# Altium PCB ARGUS.PcbDoc (part 1 of 4)
Units mm, origin at the board's own origin, x right, y up, seen from the top; angles counter-clockwise.
Board outline 134 x 81 mm, 6 copper layers (L1 [SIG], L2 [GND], L3 [PWR], L4 [SIG], L5 [GND], L6 [SIG]), stack 1.538 mm thick; 452 components, 305 nets, 1467 pads, 826 vias.
Unrouted connection lines stored in the file: 646.
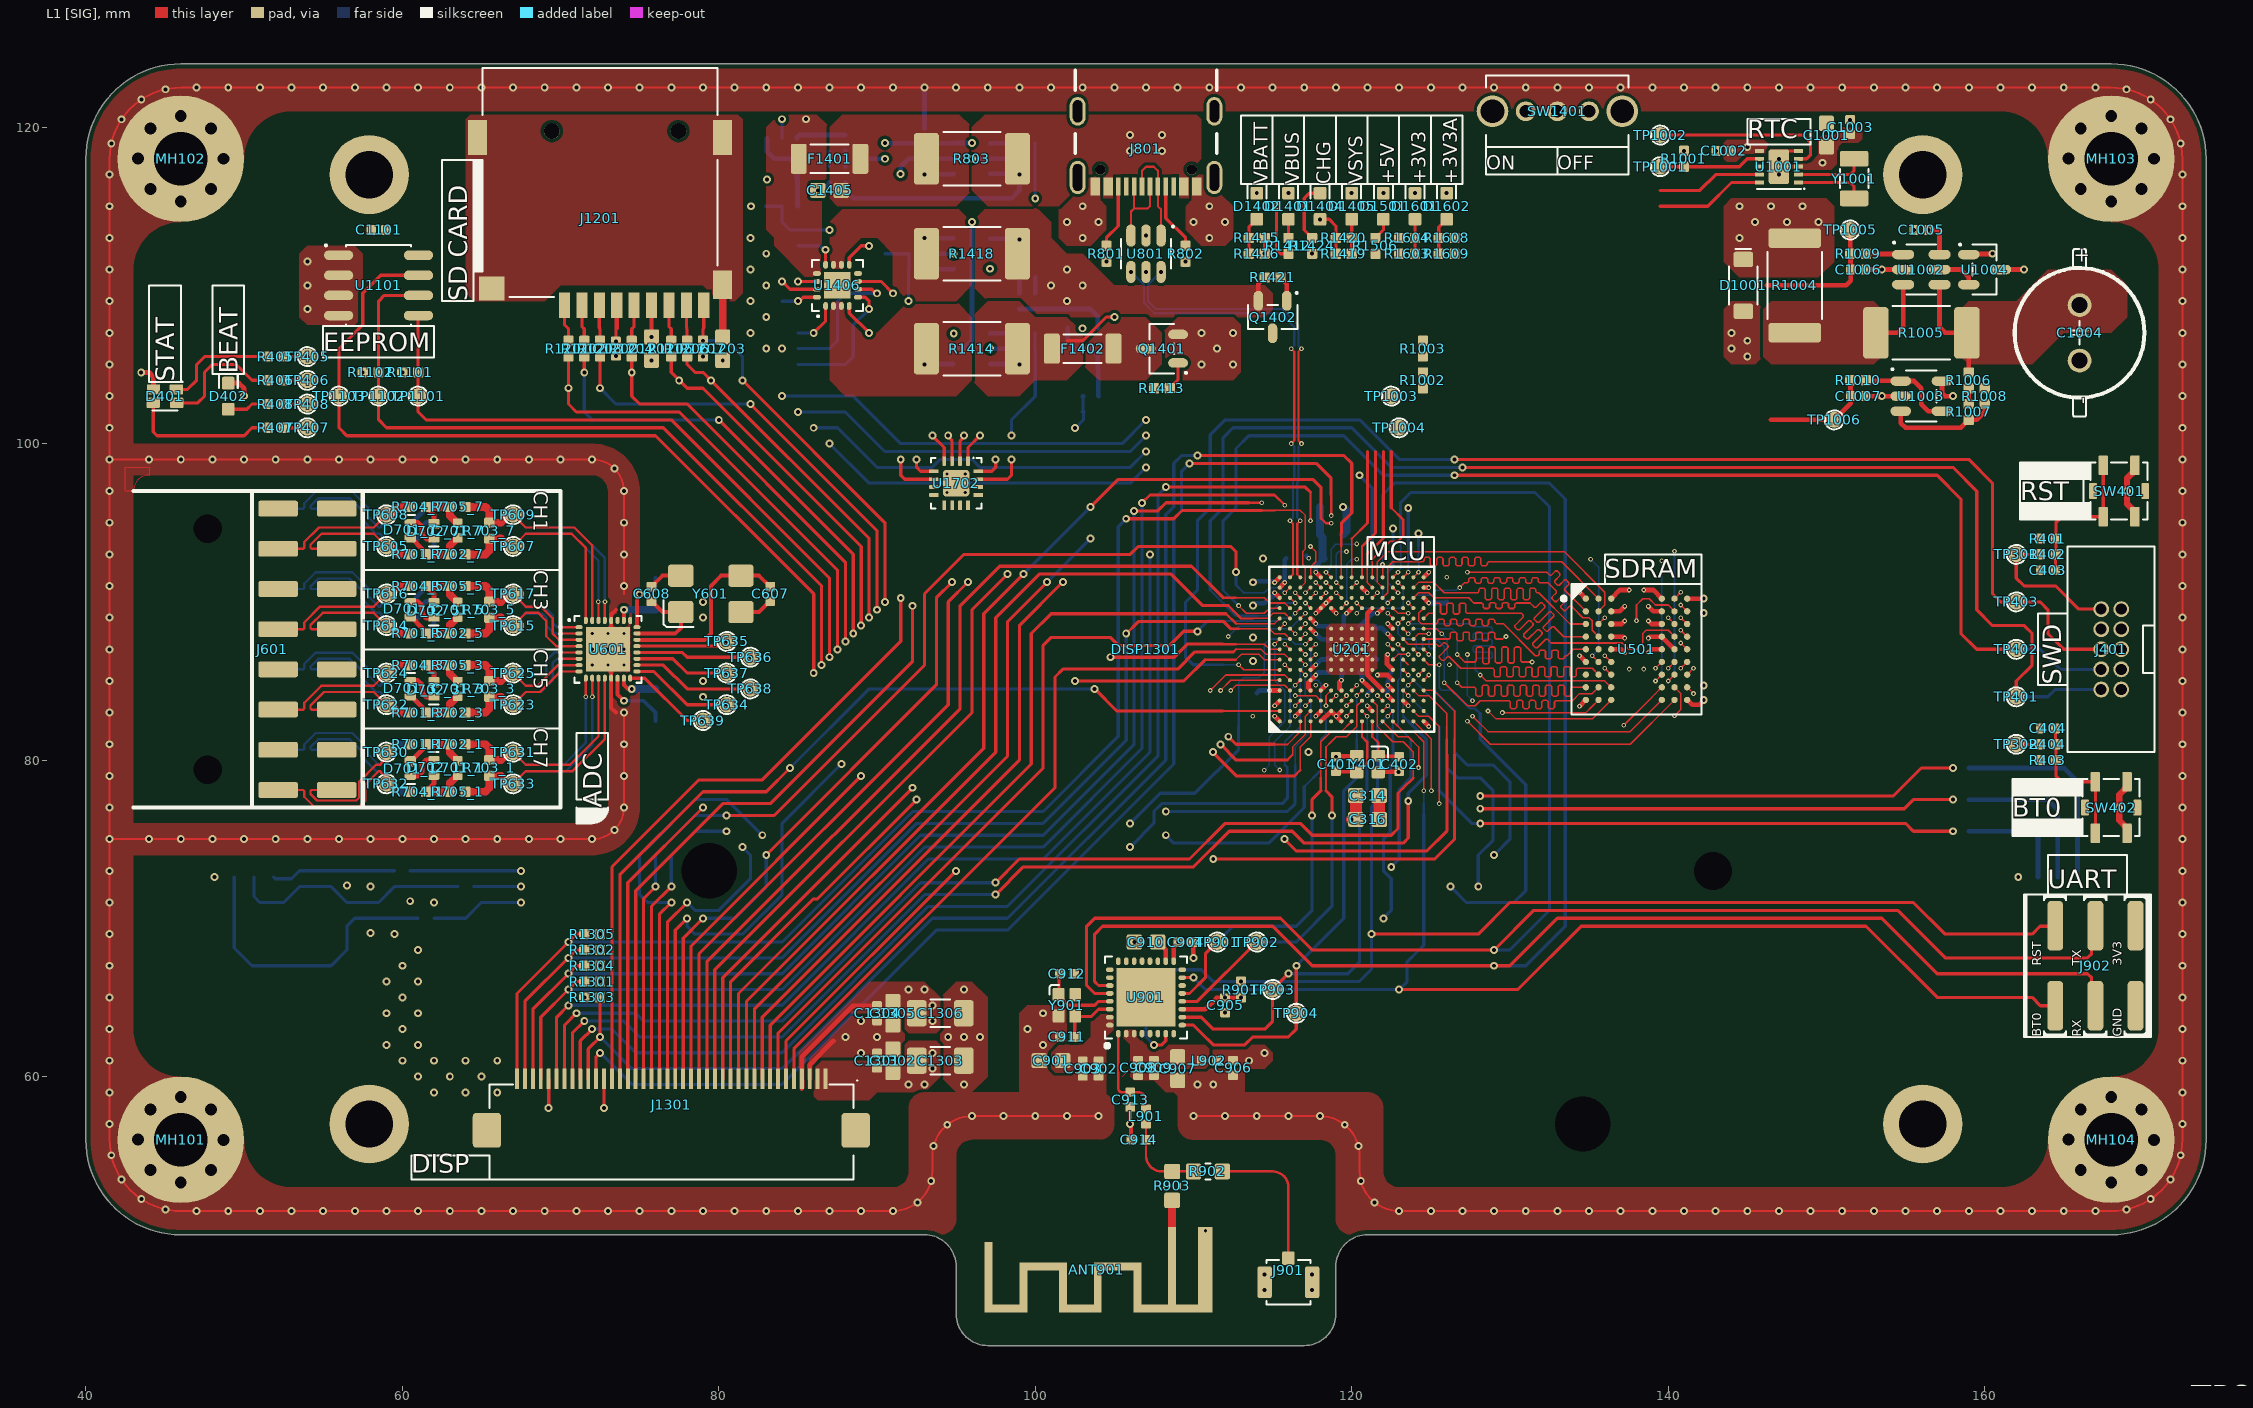
[diagram p0: L1 [SIG] view]
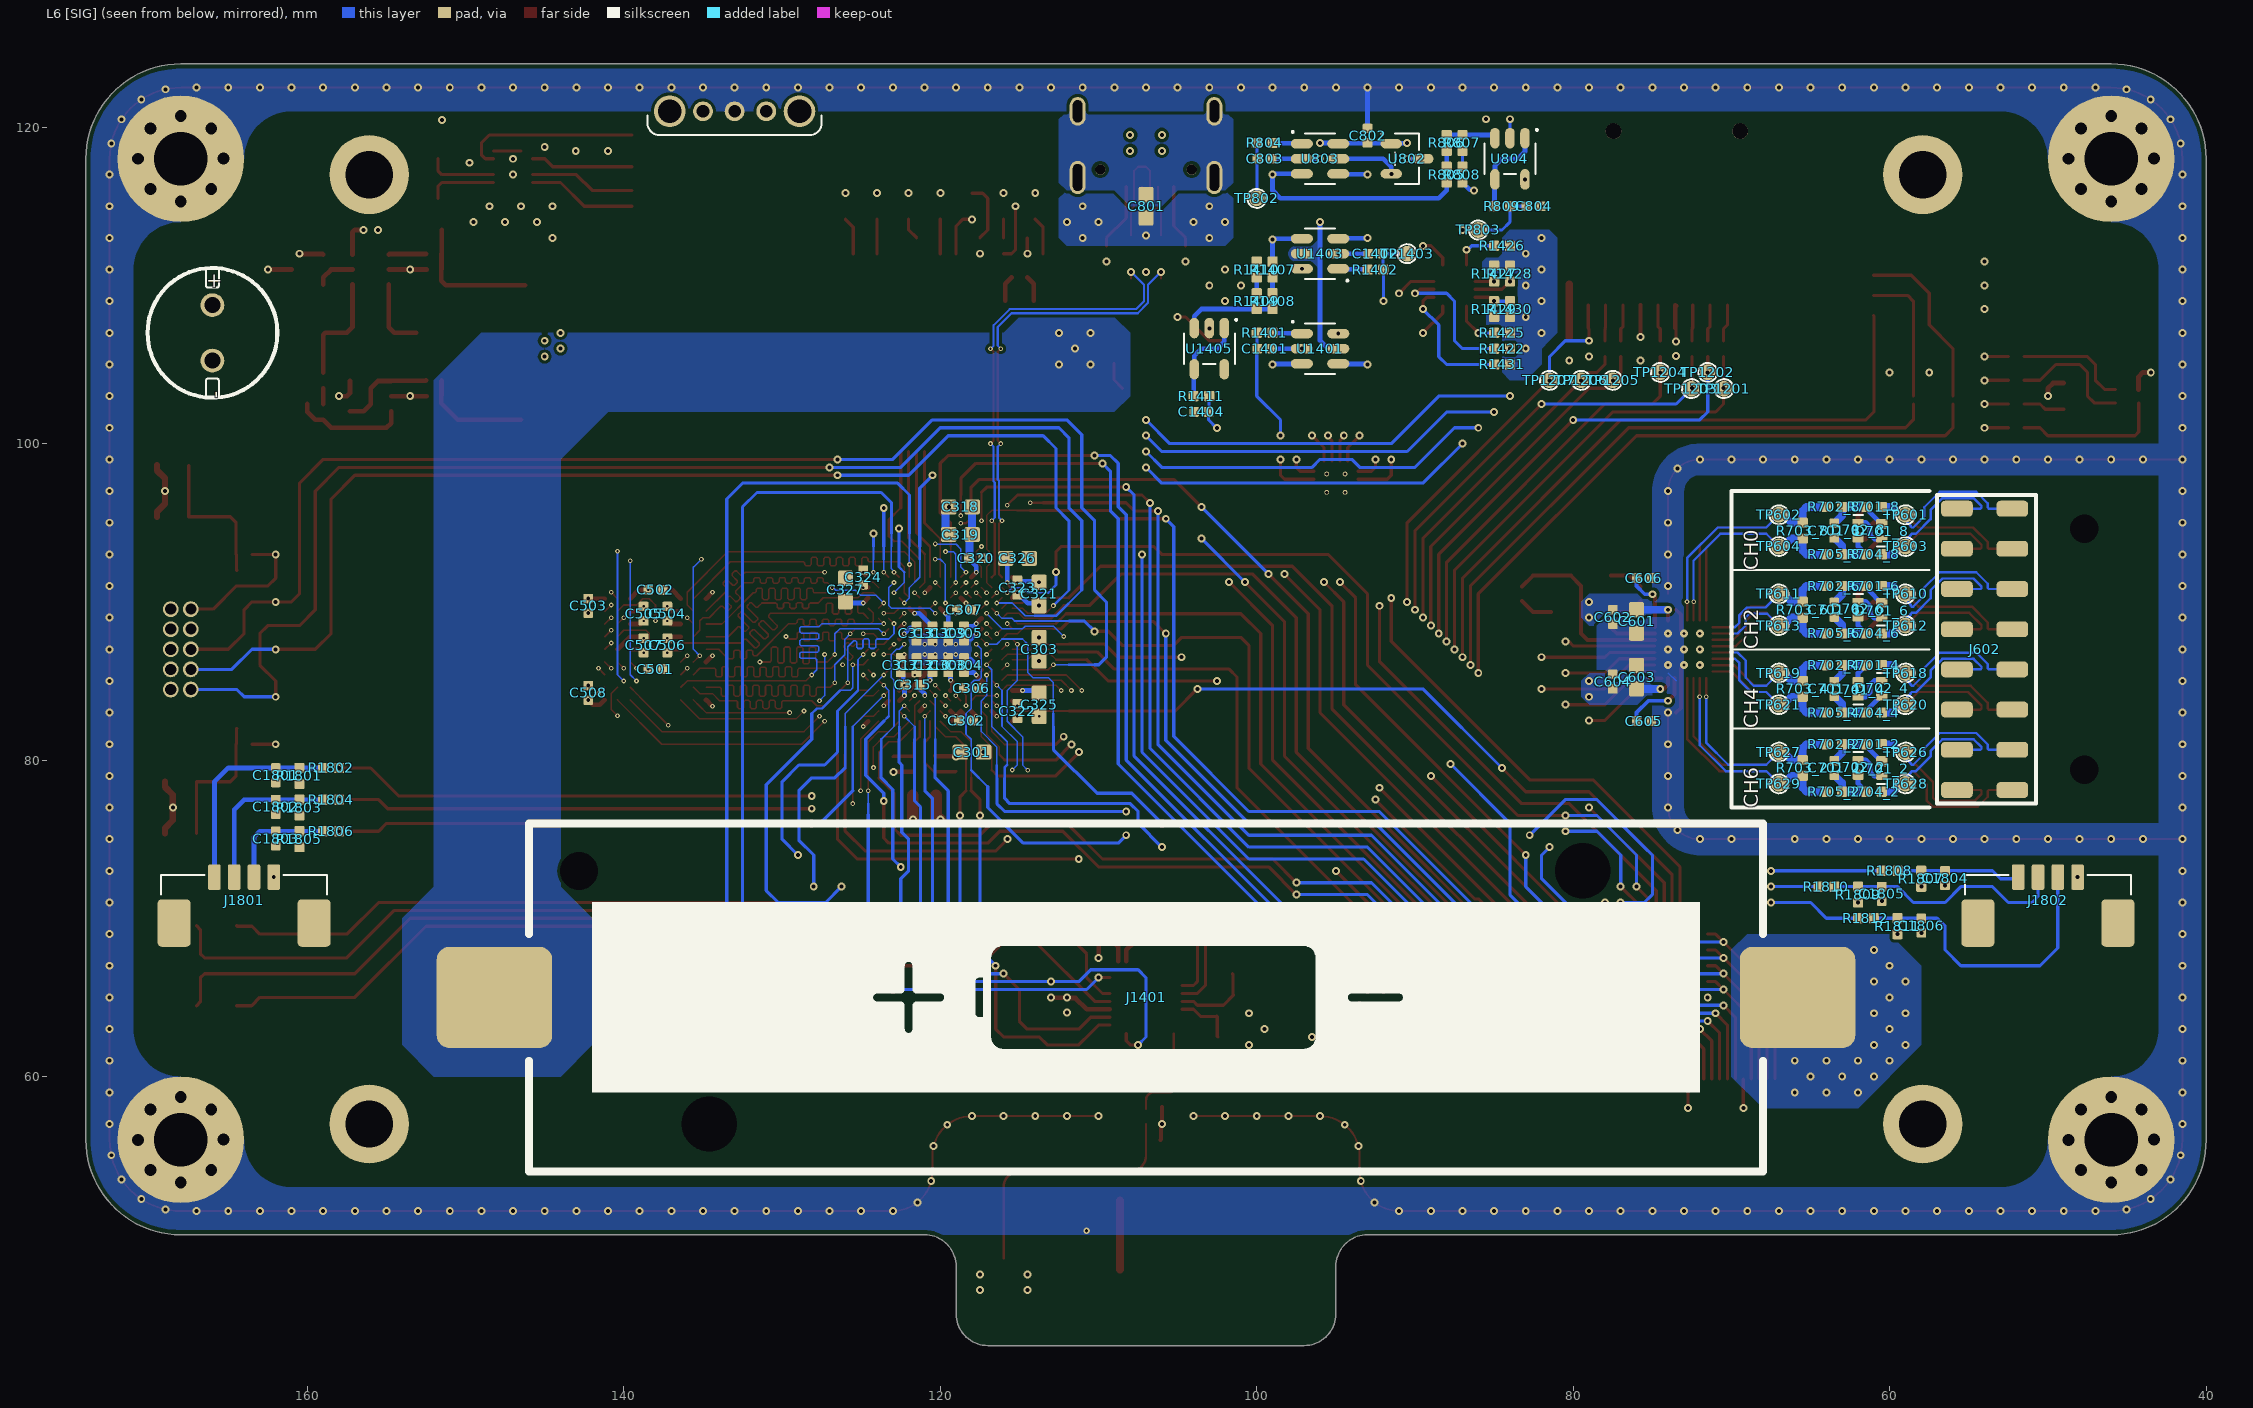
[diagram p1: L6 [SIG] view, seen from below]
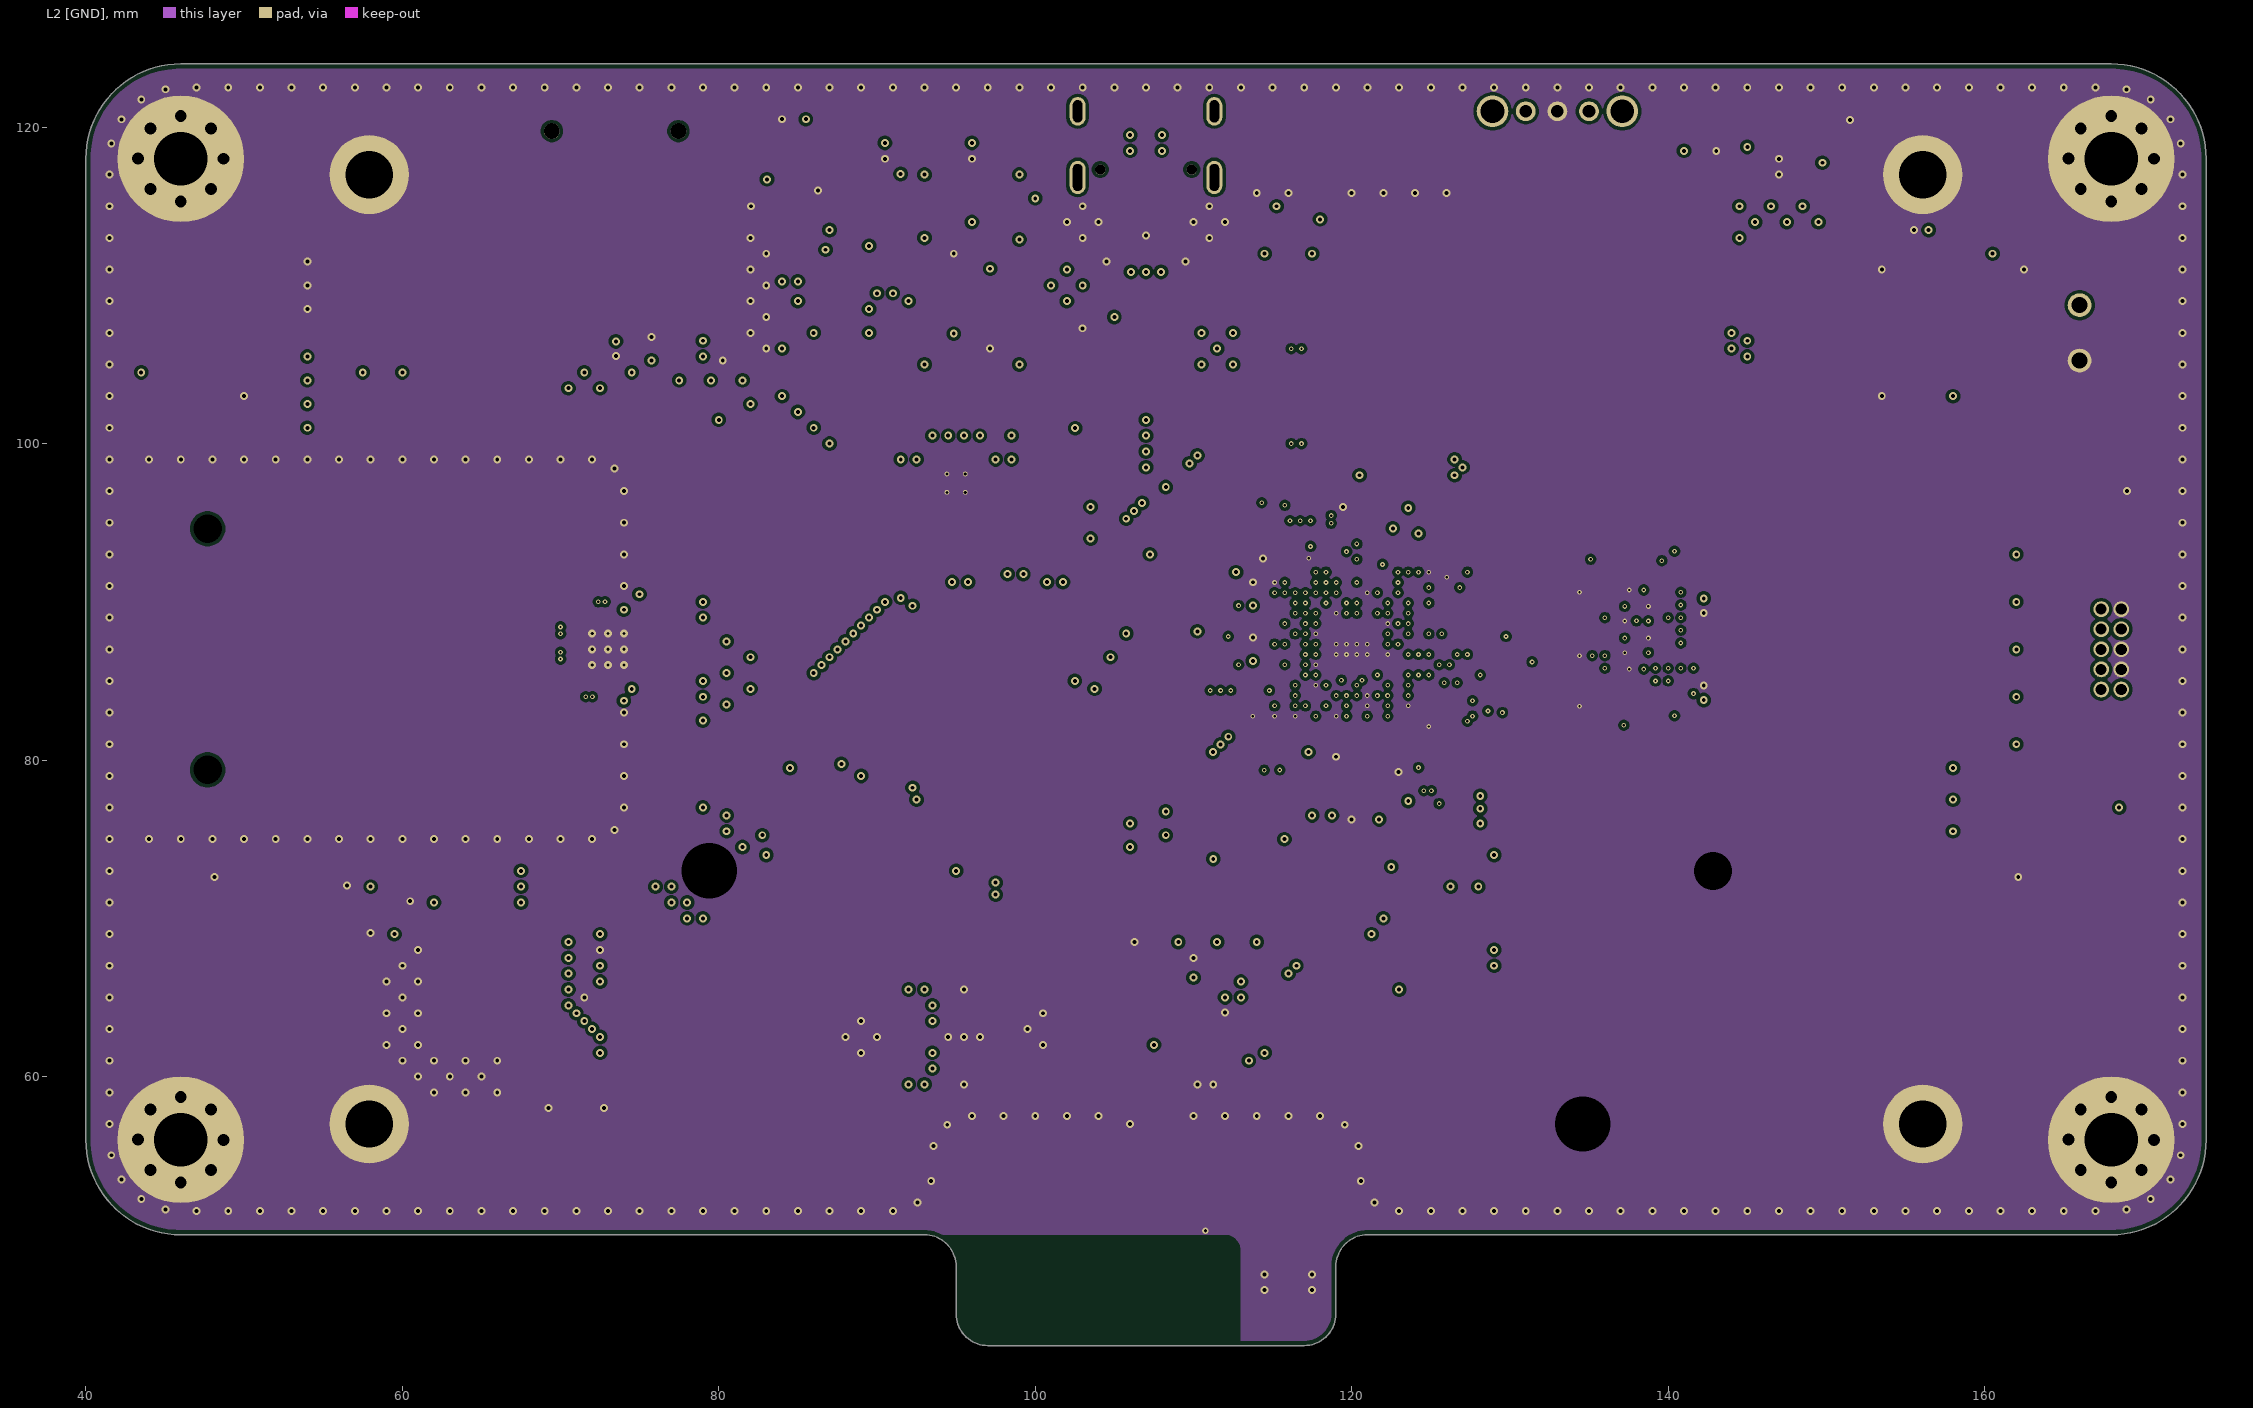
[diagram p2: L2 [GND]]
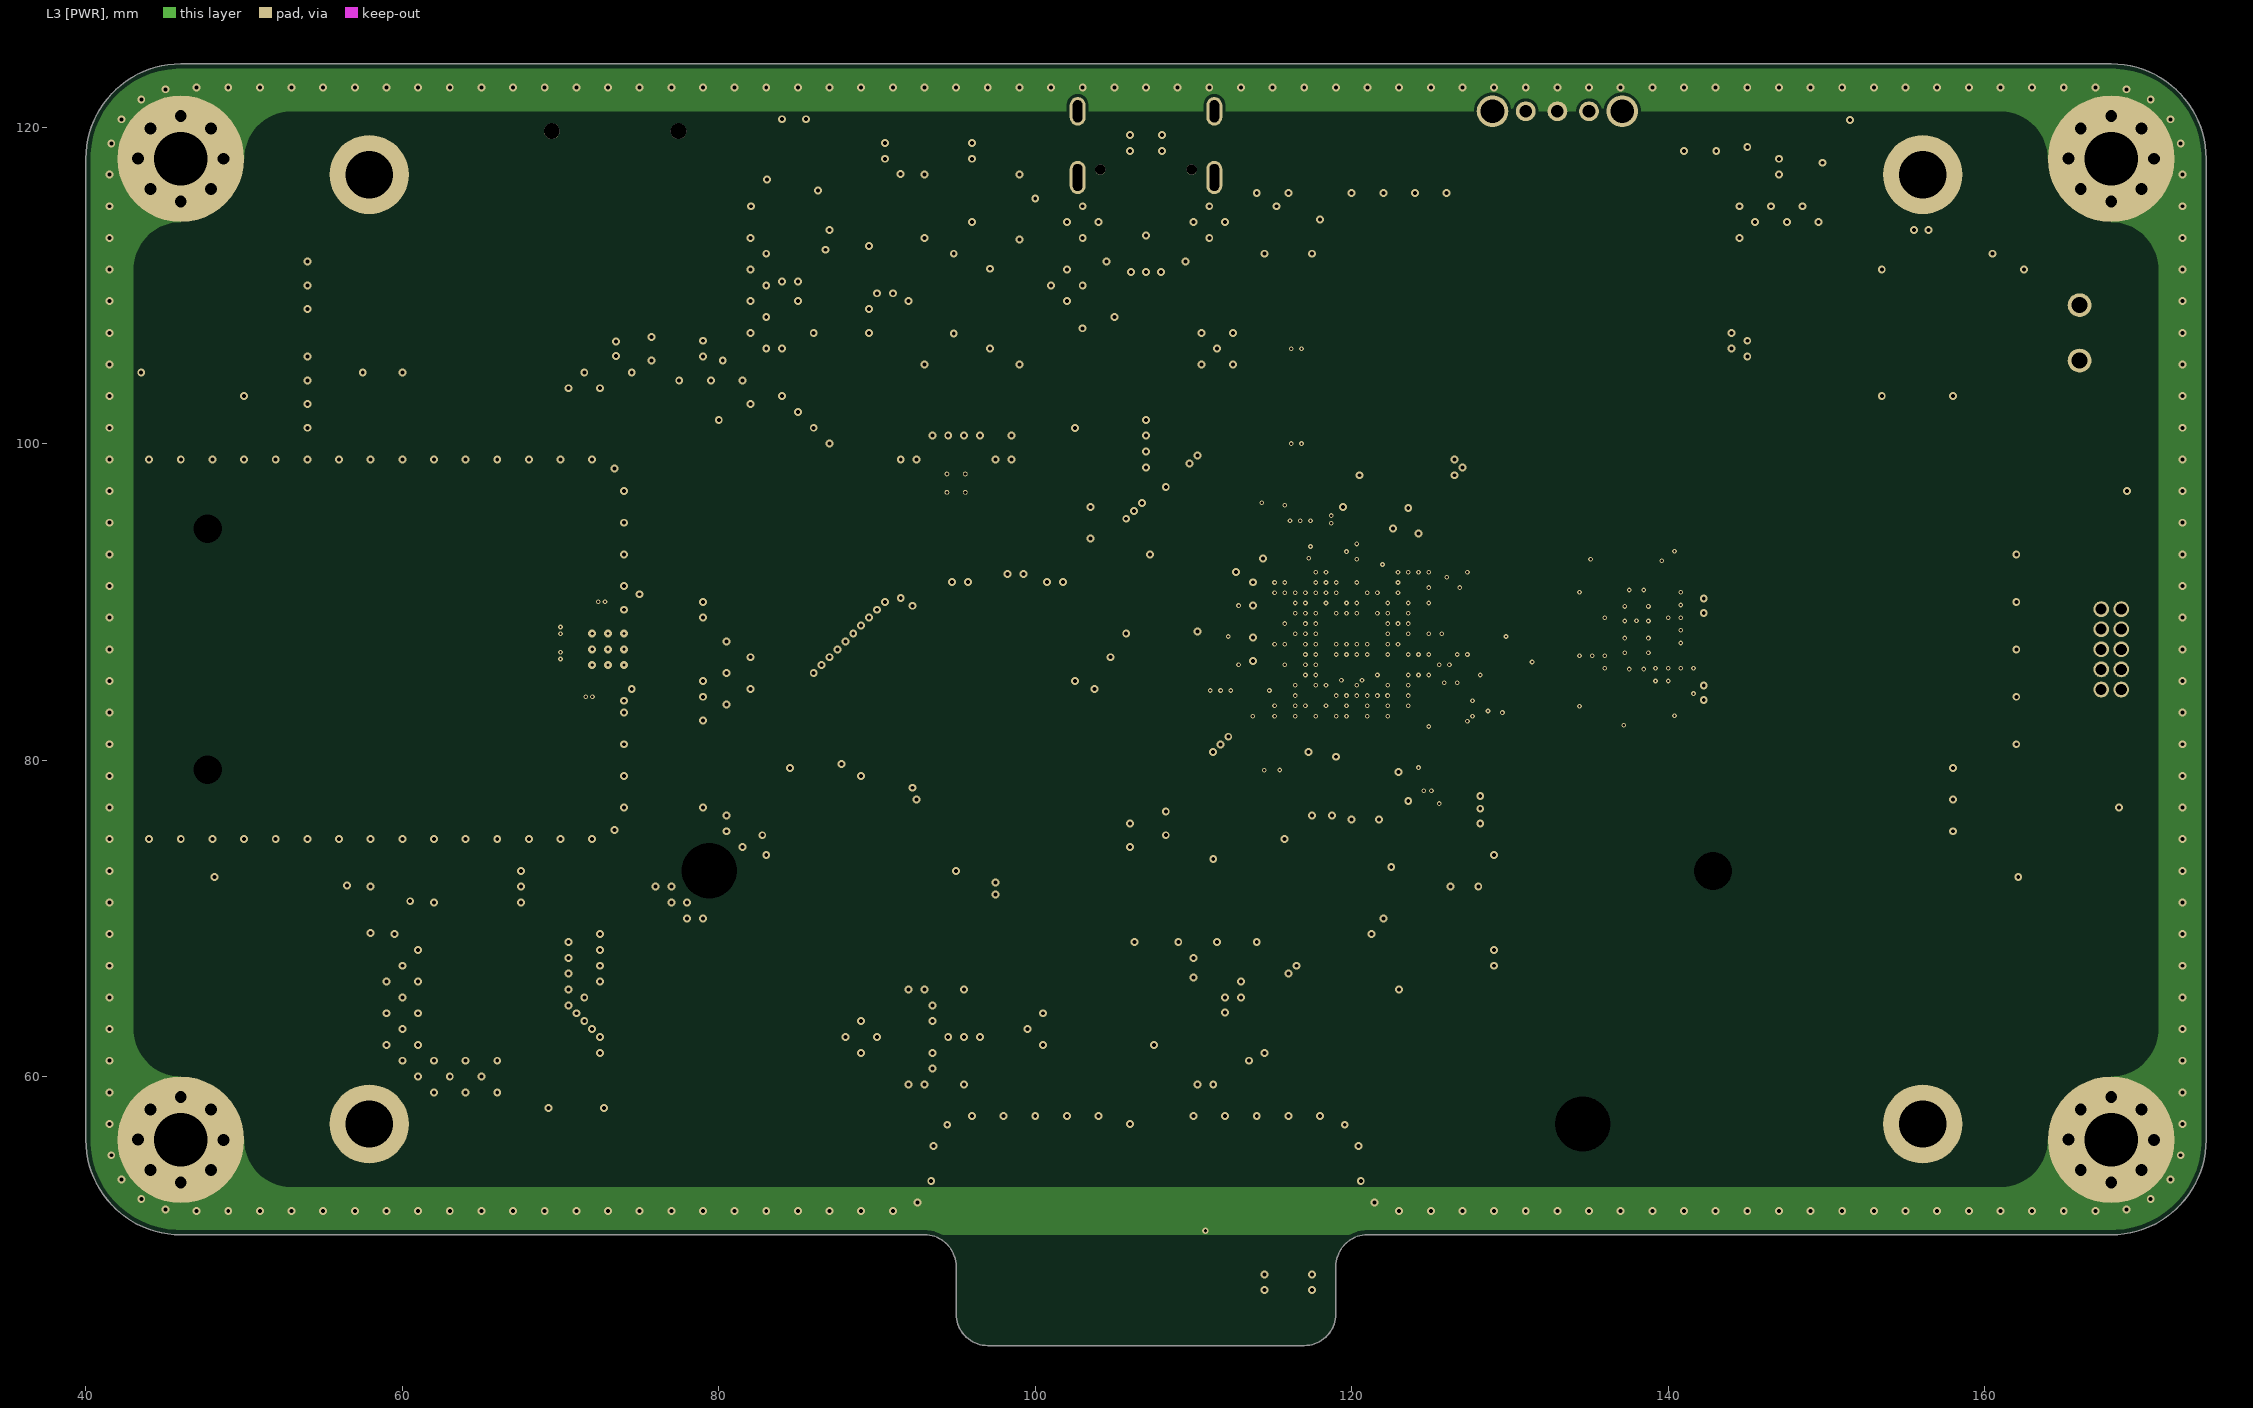
[diagram p3: L3 [PWR]]
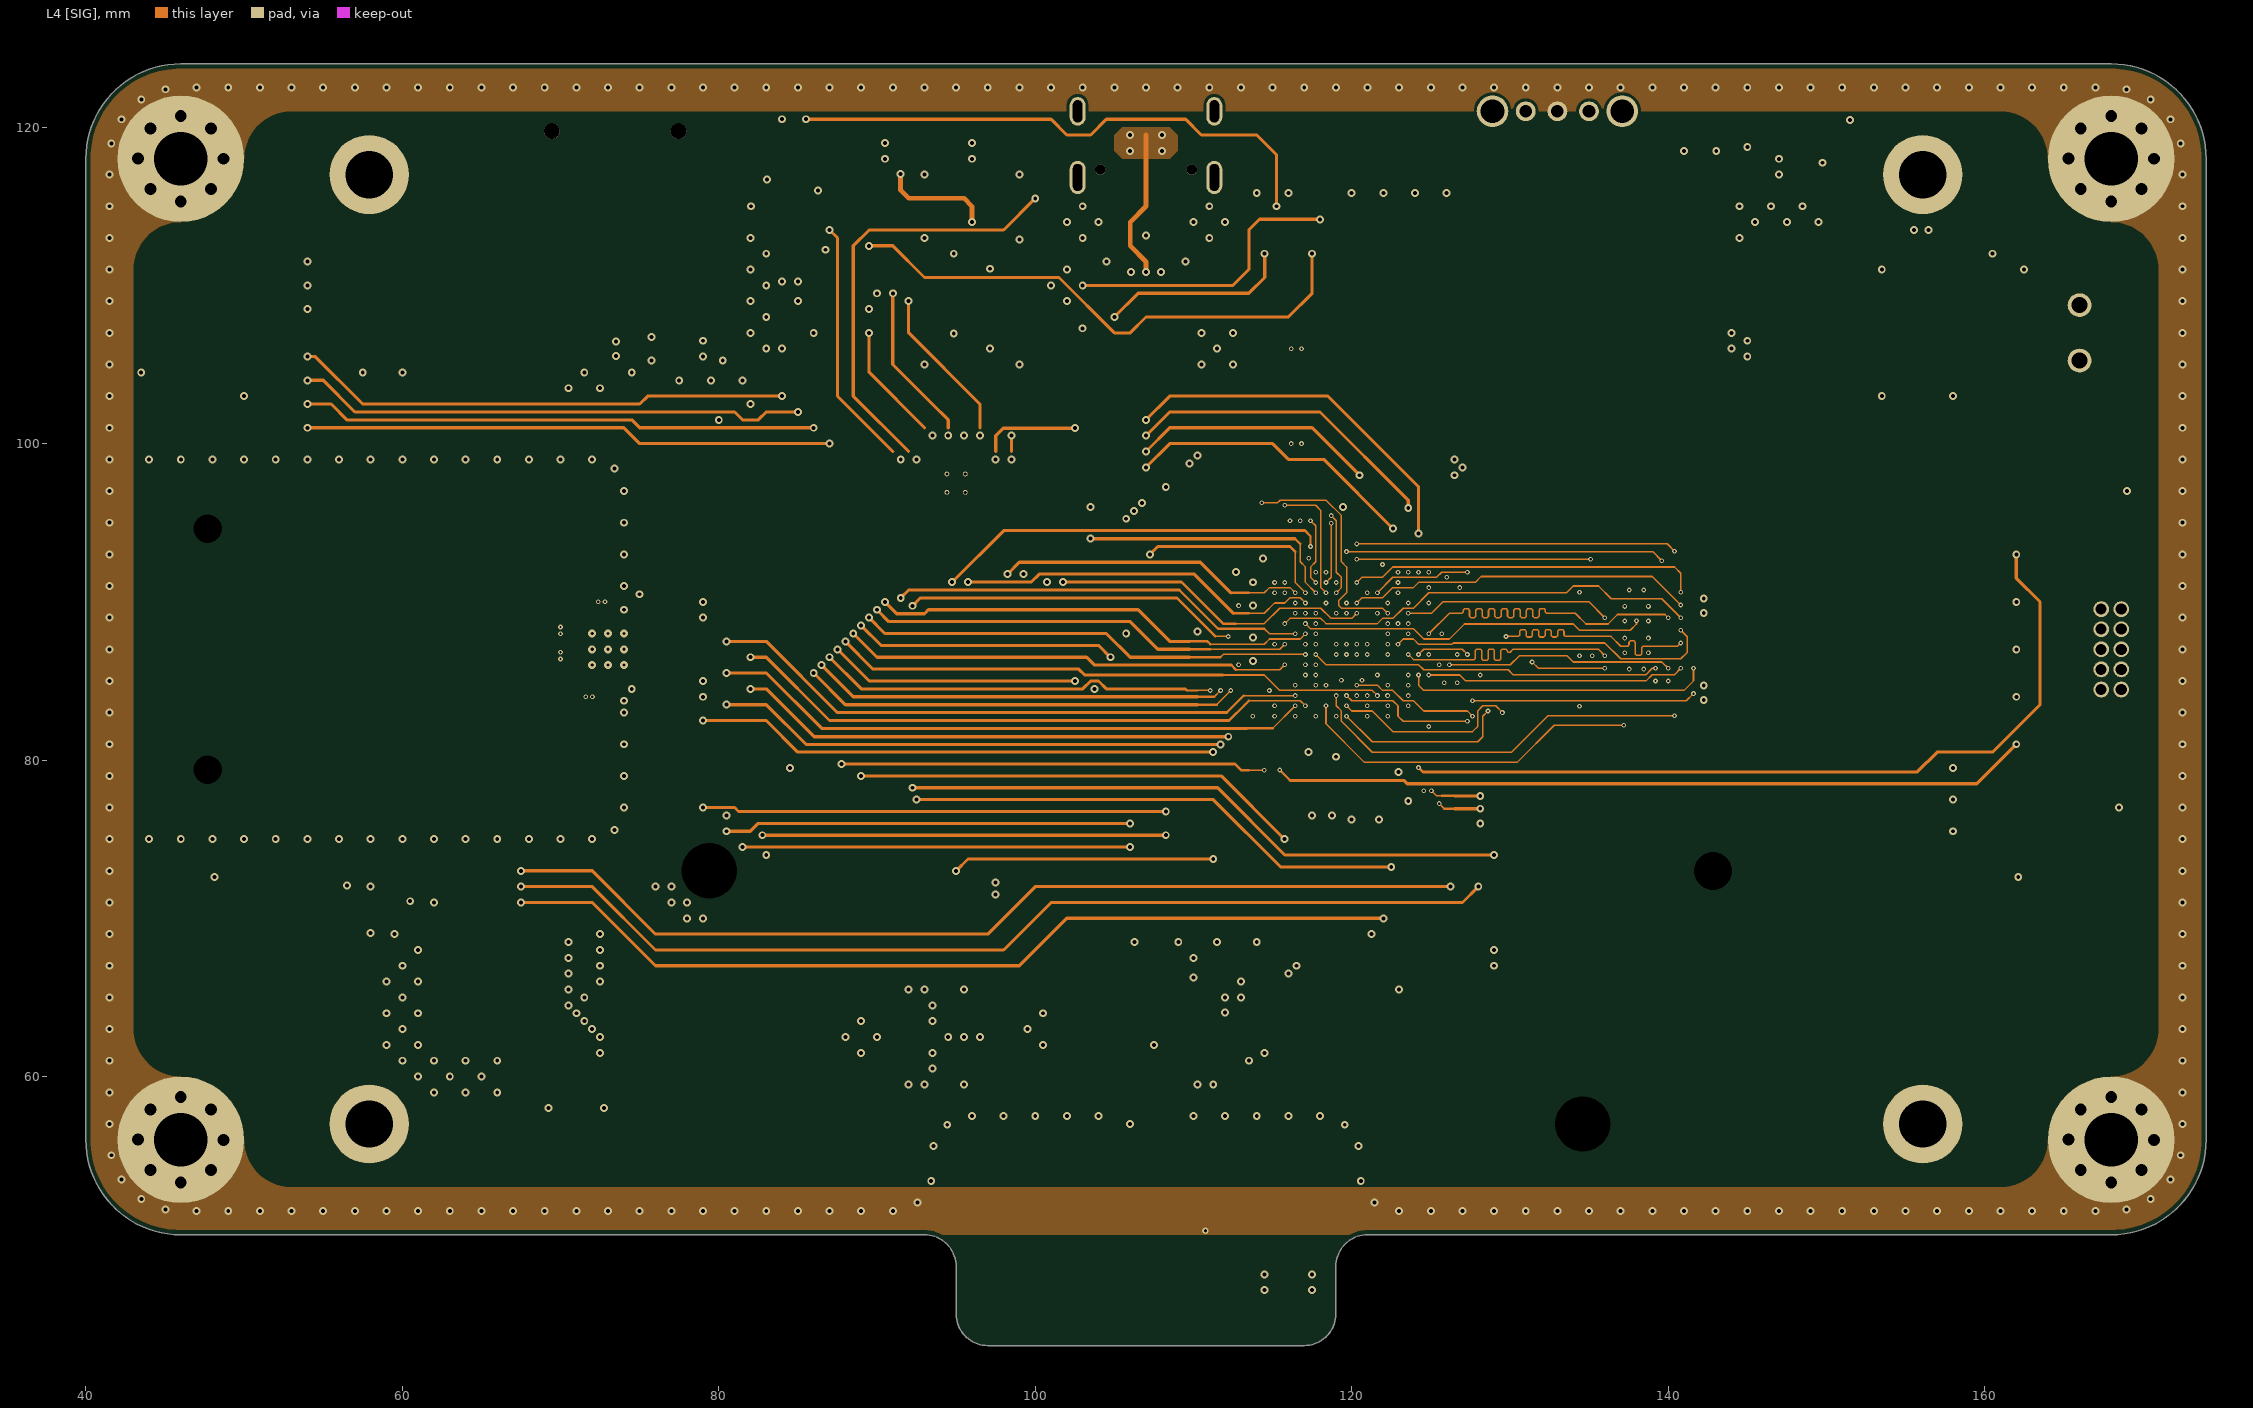
[diagram p4: L4 [SIG]]
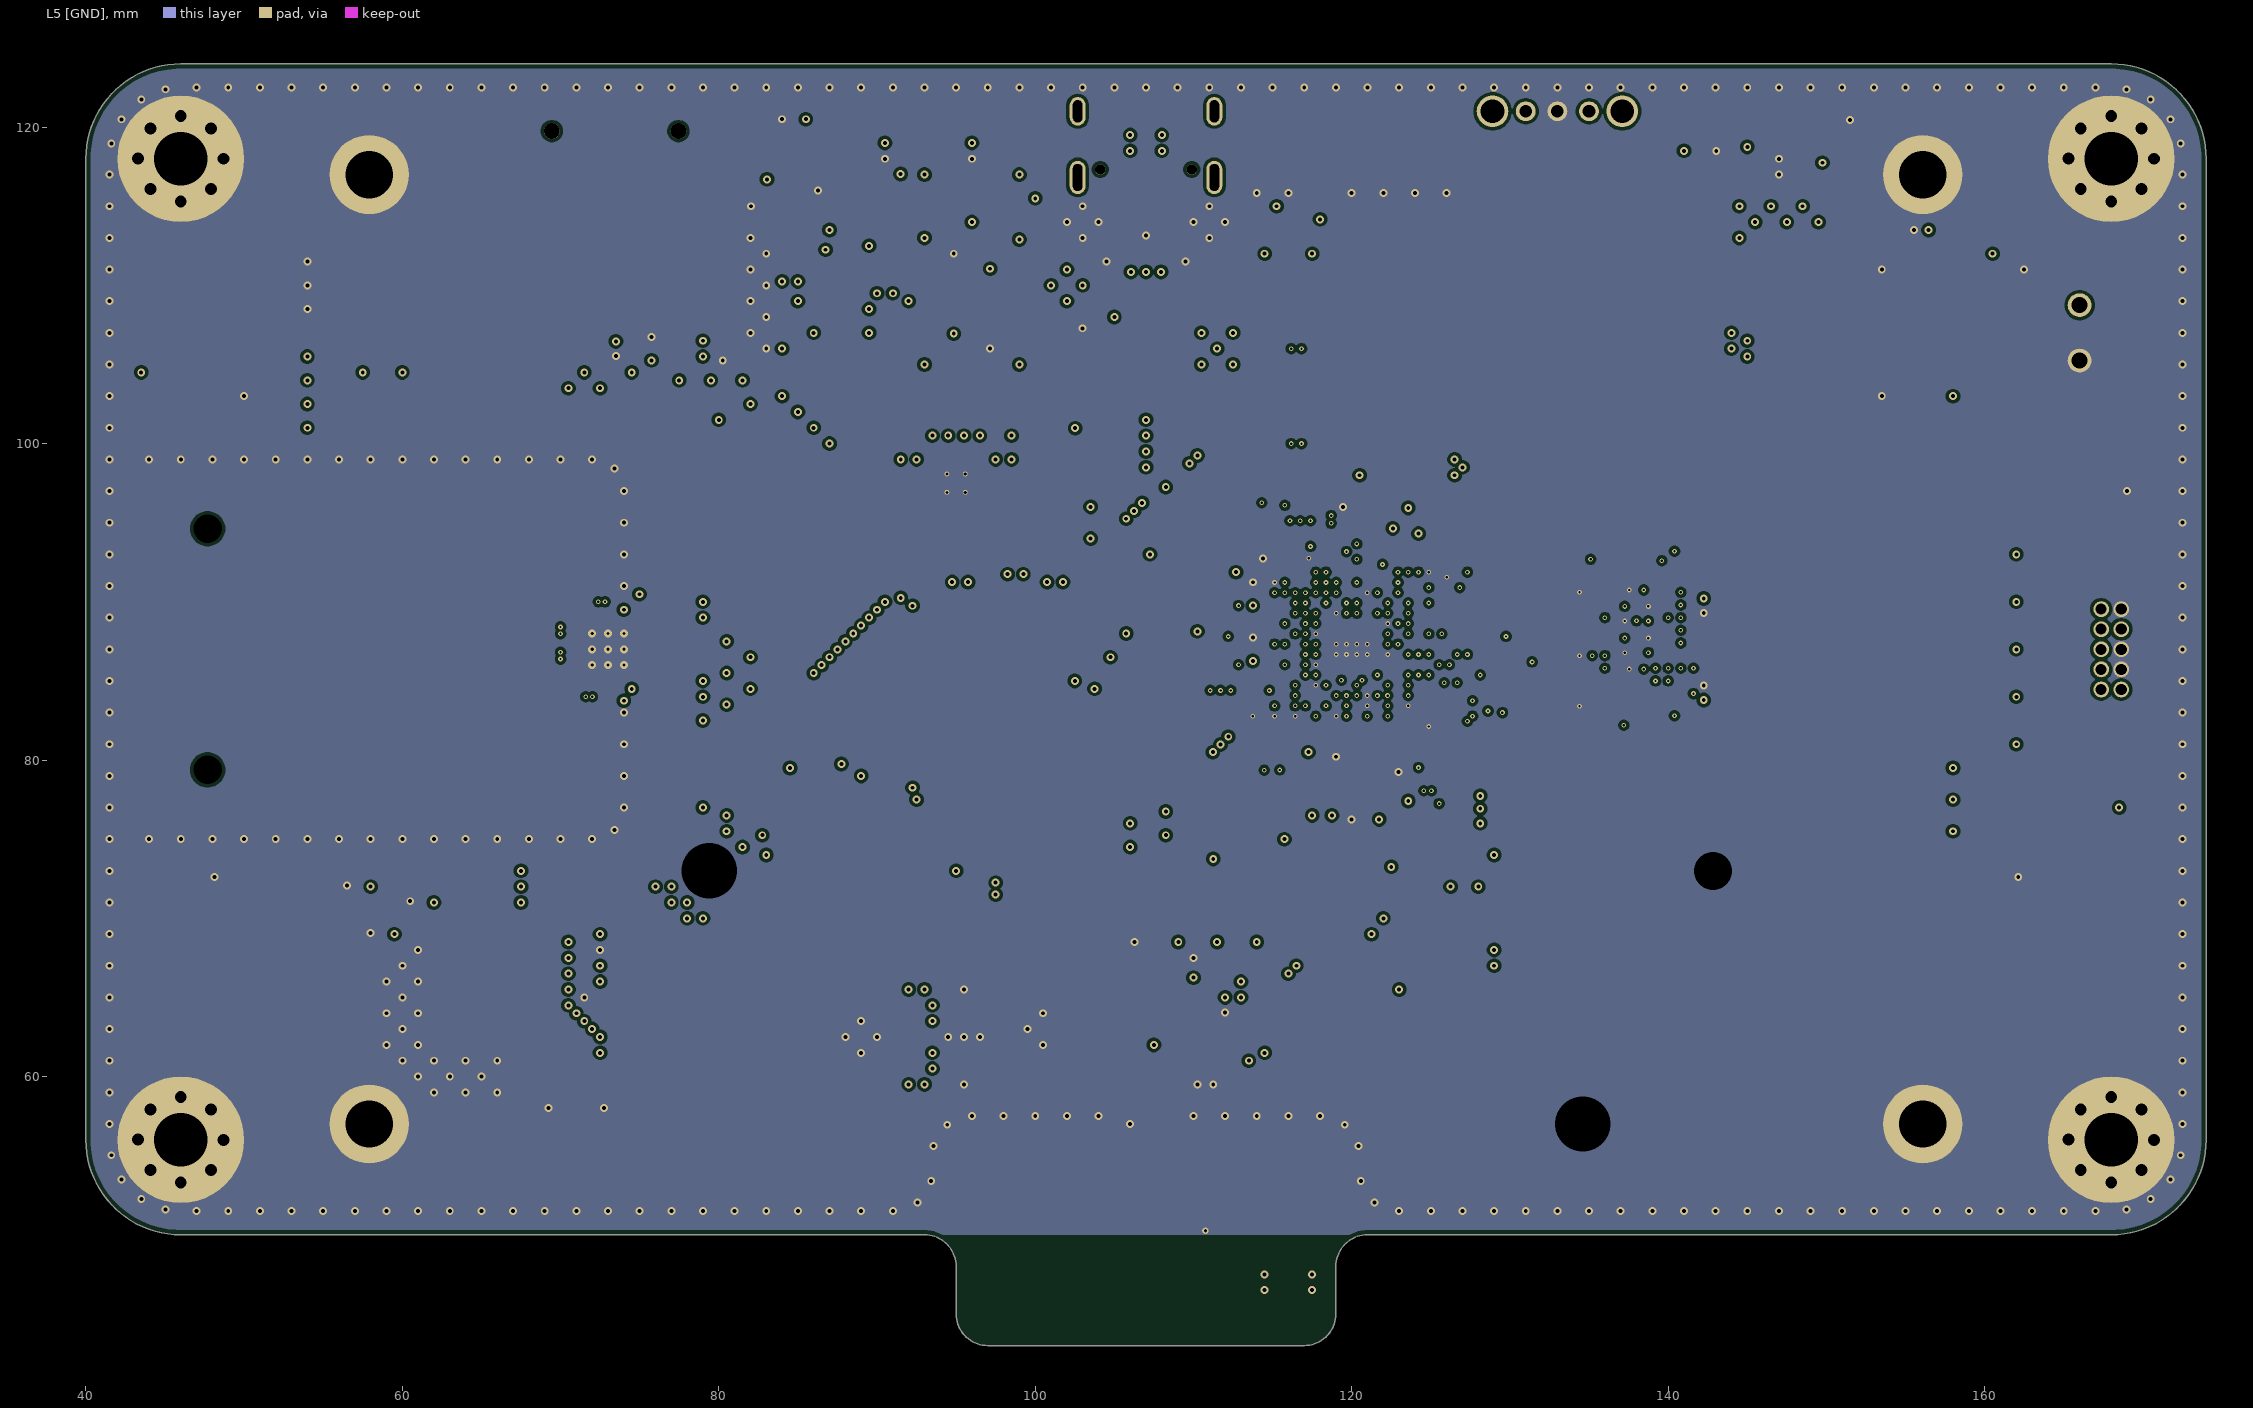
[diagram p5: L5 [GND]]

## Layer stack, top to bottom
Top Solder: solder mask 0.0102, Solder Resist, Dk 3.5
L1 [SIG]: signal copper 0.035
Dielectric 2: prepreg 0.0994, PP-006, Dk 4.6
L2 [GND]: signal copper 0.0152
Dielectric 3: prepreg 0.55, PP-006, Dk 4.6
L3 [PWR]: signal copper 0.0152
Dielectric 1: dielectric 0.1088, FR-4, Dk 4.6
L4 [SIG]: signal copper 0.0152
Dielectric 4: prepreg 0.55, PP-006, Dk 4.6
L5 [GND]: signal copper 0.0152
Dielectric 5: prepreg 0.0994, PP-006, Dk 4.6
L6 [SIG]: signal copper 0.035
Bottom Solder: solder mask 0.0102, Solder Resist, Dk 3.5

## Board outline
93,50 cw(c93,48) 95,48 95,45 ccw(c97,45) 97,43 117,43 ccw(c117,45) 119,45 119,48 cw(c121,48) 121,50 168,50 ccw(c168,56) 174,56 174,118 ccw(c168,118) 168,124 46,124 ccw(c46,118) 40,118 40,56 ccw(c46,56) 46,50

## Design rules (kind name [scope] priority, off if disabled: settings)
BoardOutlineClearance [All] p1: gap=0.3 ignorepadtopadclearanceinfootprint=FALSE except(0.4: Arc-SplitBarrior Arc-SplitContinuation Track-SplitBarrior Track-SplitContinuation SMDPad-SplitBarrior SMDPad-SplitContinuation THPad-SplitBarrior THPad-SplitContinuation Via-SplitBarrior Via-SplitContinuation Fill-SplitBarrior Fill-SplitContinuation Poly-SplitBarrior Poly-SplitContinuation Region-SplitBarrior Region-SplitContinuation Text-SplitBarrior Text-SplitContinuation)
Clearance "Clearance Same Net Via Hole" [IsVia] p1: gap=0.2 ignorepadtopadclearanceinfootprint=FALSE except(0: Arc-SMDPad Arc-Via Arc-Hole Track-SMDPad Track-Via Track-Hole SMDPad-Via SMDPad-Hole THPad-Hole Via-Hole Fill-Hole Poly-Hole Region-Hole; 0.089: Arc-Arc Arc-Track Track-Track SMDPad-SMDPad; 0.127: THPad-Via; 0.254: Arc-Text Track-Text SMDPad-Text THPad-Text Via-Via Via-Text Fill-Text Poly-Text Region-Text Text-Text)
Clearance Clearance_BGA [IsBGA] p2: gap=0.1 ignorepadtopadclearanceinfootprint=FALSE
Clearance "Clearance Different Nets" [All] p3: gap=0.2 ignorepadtopadclearanceinfootprint=FALSE except(0.089: Arc-Arc Arc-Track Arc-SMDPad Track-Track Track-SMDPad; 0.1: Arc-Via Track-Via; 0.127: SMDPad-SMDPad SMDPad-Via THPad-Via Via-Via; 0.254: Arc-Text Track-Text SMDPad-Text THPad-Text Via-Text Fill-Text Poly-Text Region-Text Text-Text; 0.5: THPad-THPad)
Clearance "Clearance Same Nets" [All] p4: gap=0.2 ignorepadtopadclearanceinfootprint=FALSE except(0: Arc-SMDPad Arc-Via Track-SMDPad Track-Via SMDPad-Via; 0.089: Arc-Arc Arc-Track Track-Track SMDPad-SMDPad; 0.127: THPad-Via; 0.254: Arc-Text Track-Text SMDPad-Text THPad-Text Via-Via Via-Text Fill-Text Poly-Text Region-Text Text-Text)
ComponentClearance ADC_Connectors [InComponent('J601') vs InComponent('J602')] p1: gap=0 collisioncheckmode=3 verticalgap=0 showdistances=TRUE donotcheckwithout3dbody=TRUE
ComponentClearance [All] p2: gap=0.254 collisioncheckmode=3 verticalgap=0.254 showdistances=FALSE
DiffPairsRouting USB [InDifferentialPair('USB_D')] p1: maxlimit=0.254 minlimit=0.127 mostfreqgap=0.254 toplayer_maxgap=0.127 toplayer_prefgap=0.127 toplayer_minwidth=0.135 toplayer_maxwidth=0.135 toplayer_prefwidth=0.135 bottomlayer_maxgap=0.127 bottomlayer_prefgap=0.127 bottomlayer_minwidth=0.135 bottomlayer_maxwidth=0.135 bottomlayer_prefwidth=0.135 impedanceprofiledriven=TRUE impedanceprofileid={37B9CDEC-94E1-451A-9C66-9438EE18573B} impedanceprofilevalue=90.000000 maxuncoupledlength=12.7
DiffPairsRouting [InNetClass('AINX')] p2: maxlimit=0.5 minlimit=0.2 mostfreqgap=0.25 toplayer_minwidth=0.15 toplayer_maxwidth=0.5 toplayer_prefwidth=0.15 midlayer1_minwidth=0.15 midlayer1_maxwidth=0.5 midlayer1_prefwidth=0.15 midlayer2_minwidth=0.15 midlayer2_maxwidth=0.5 midlayer2_prefwidth=0.15 midlayer3_minwidth=0.15 midlayer3_maxwidth=0.5 midlayer3_prefwidth=0.15 midlayer4_minwidth=0.15 midlayer4_maxwidth=0.5 midlayer4_prefwidth=0.15 bottomlayer_minwidth=0.15 bottomlayer_maxwidth=0.5 bottomlayer_prefwidth=0.15 maxuncoupledlength=12.7
HoleSize [All] p1: absolutevalues=TRUE maxlimit=6.3 minlimit=0.2 maxpercent=80.000 minpercent=20.000
MatchedLengths USB_1 [InDifferentialPair('USB_D')] p1: tolerance=25.4 checknetsindiffpair=FALSE checkdiffpairvsdiffpair=TRUE checkxsignals=TRUE checkothers=TRUE usedelayunits=TRUE delaytolerance=10.000000 phasematching=TRUE phasedelaytolerance=5.000000 phasedistance=12.7
MatchedLengths SDRAM_ACC [InNetClass('SDRAM_ACC')] p2: tolerance=25.4 checknetsindiffpair=FALSE checkdiffpairvsdiffpair=TRUE checkxsignals=TRUE checkothers=TRUE usedelayunits=TRUE delaytolerance=100.000000
MatchedLengths SDRAM_MSB [InNetClass('SDRAM_MSB')] p3: tolerance=25.4 checknetsindiffpair=FALSE checkdiffpairvsdiffpair=TRUE checkxsignals=TRUE checkothers=TRUE usedelayunits=TRUE delaytolerance=50.000000
MatchedLengths SDRAM_LSB [InNetClass('SDRAM_LSB')] p4: tolerance=25.4 checknetsindiffpair=FALSE checkdiffpairvsdiffpair=TRUE checkxsignals=TRUE checkothers=TRUE usedelayunits=TRUE delaytolerance=50.000000
MinimumAnnularRing [All] p1: minimumring=0.13
MinimumSolderMaskSliver [All] p1: minsoldermaskwidth=0.1
PlaneConnect SD_Shielf_TR [InNet('SH')] p1: planeconnectstyle=Relief reliefexpansion=0.508 reliefentries=2 reliefconductorwidth=0.254 reliefairgap=0.254
PlaneConnect [All] p2: planeconnectstyle=Direct reliefexpansion=0.508 reliefentries=4 reliefconductorwidth=0.254 reliefairgap=0.254
PolygonConnect PolygonConnect_1 [All] p1: connectstyle=Direct reliefconductorwidth=0.508 reliefentries=4 polygonreliefangle="90 Angle" airgapwidth=0.254
RoutingCorners [All] p1: cornerstyle=Round minsetback=2.54 maxsetback=2.54
RoutingVias [All] p1: holewidth=0.5 width=1 viastyle="Through Hole" minholewidth=0.15 minwidth=0.3 maxholewidth=1 maxwidth=2
SilkToSilkClearance [All] p1: silktosilkclearance=0.1
SilkToSolderMaskClearance [IsPad] p1: minsilkscreentomaskgap=0.1 clearancetoexposedcopper=TRUE
SolderMaskExpansion RF [InNetClass('50Ohm')] p1: expansion=0.102 istentingtop=FALSE
SolderMaskExpansion SolderMaskExpansion_1 [IsVia] p2: expansion=0 istentingtop=TRUE
SolderMaskExpansion [All] p3: expansion=0.102 istentingtop=FALSE
SupplyNets "Schematic Supply Nets_8" [InNet('VBUS')] p1: voltage=0.000
SupplyNets "Schematic Supply Nets_7" [InNet('+3V3')] p2: voltage=0.000
SupplyNets "Schematic Supply Nets_6" [InNet('+3V3A')] p3: voltage=0.000
SupplyNets "Schematic Supply Nets_5" [InNet('+1V65_REF')] p4: voltage=0.000
SupplyNets "Schematic Supply Nets_4" [InNet('GND')] p5: voltage=0.000
SupplyNets "Schematic Supply Nets_3" [InNet('VSYS')] p6: voltage=0.000
SupplyNets "Schematic Supply Nets_2" [InNet('VBATT')] p7: voltage=0.000
SupplyNets "Schematic Supply Nets_1" [InNet('+3V3_RTC')] p8: voltage=0.000
SupplyNets "Schematic Supply Nets" [InNet('+5V')] p9: voltage=0.000
UnRoutedNet [All] p1: checkbadconnections=TRUE
ViasUnderSMD ViaInPad [All] p1: allowed=TRUE
Width 50_Ohm [InNetClass('50Ohm')] p1: maxlimit=0.254 minlimit=0.156 preferedwidth=0.254 toplayer_maxwidth=0.156 toplayer_prefwidth=0.156 bottomlayer_maxwidth=0.156 bottomlayer_prefwidth=0.156 impedanceprofiledriven=TRUE impedanceprofileid={FE5E3495-A3D8-4B9C-B8DF-E09ADCE43C69} impedanceprofilevalue=50.000000 minimp=50.000000 maximp=50.000000 favimp=50.000000
Width [All] p2: maxlimit=2.54 minlimit=0.089 preferedwidth=0.254 minimp=50.000000 maximp=50.000000 favimp=50.000000
21 further rules are at their usual default settings.

## Classes and differential pairs
component class Encoders: C1801 C1802 C1803 C1804 C1805 C1806 J1801 J1802 R1801 R1802 R1803 R1804 R1805 R1806 R1807 R1808 R1809 R1810 R1811 R1812
component class Power_Sense: C1701 C1702 C1703 C1704 C1705 C1706 C1707 C1708 C1709 C1710 R1701 R1702 U1701 U1702
net class USB: USB_D_N USB_D_P
net class 50Ohm: ANT_IN LNA_IN
net class AINX: AIN0_N AIN0_P AIN1_N AIN1_P AIN2_N AIN2_P AIN3_N AIN3_P AIN4_N AIN4_P AIN5_N AIN5_P AIN6_N AIN6_P AIN7_N AIN7_P
net class SDRAM_LSB: SDRAM_DQ0 SDRAM_DQ1 SDRAM_DQ2 SDRAM_DQ3 SDRAM_DQ4 SDRAM_DQ5 SDRAM_DQ6 SDRAM_DQ7
net class SDRAM_MSB: SDRAM_DQ8 SDRAM_DQ9 SDRAM_DQ10 SDRAM_DQ11 SDRAM_DQ12 SDRAM_DQ13 SDRAM_DQ14 SDRAM_DQ15
net class LTDC_GREEN: LTDC_G0 LTDC_G1 LTDC_G2 LTDC_G3 LTDC_G4 LTDC_G5 LTDC_G6 LTDC_G7
net class LTDC_BLUE: LTDC_B0 LTDC_B1 LTDC_B2 LTDC_B3 LTDC_B4 LTDC_B5 LTDC_B6 LTDC_B7
net class SDRAM_ACC: SDRAM_A0 SDRAM_A1 SDRAM_A2 SDRAM_A3 SDRAM_A4 SDRAM_A5 SDRAM_A6 SDRAM_A7 SDRAM_A8 SDRAM_A9 SDRAM_A10 SDRAM_A11 SDRAM_BA0 SDRAM_BA1 SDRAM_CAS SDRAM_CKE SDRAM_CLK SDRAM_CS SDRAM_RAS SDRAM_WE
component class Top_Level: MH101 MH102 MH103 MH104
channel class ADC_Frontend: ADC_Frontend1 ADC_Frontend2 ADC_Frontend3 ADC_Frontend4 ADC_Frontend5 ADC_Frontend6 ADC_Frontend7 CH0
net class SDMMC: CLK CMD CON_CLK CON_CMD CON_DAT0 CON_DAT1 CON_DAT2 CON_DAT3 DAT0 DAT1 DAT2 DAT3
component class USB: C801 C802 C803 C804 J801 R801 R802 R803 R804 R805 R806 R807 R808 R809 TP801 TP802 TP803 TP? U801 U802 U803 U804 U?
component class "SD Card": C1201 C1202 C1203 J1201 R1201 R1202 R1203 R1204 R1205 R1206 R1207 TP1201 TP1202 TP1203 TP1204 TP1205 TP1206 TP1207 TP?
component class RTC: C1001 C1002 C1003 C1004 C1005 C1006 C1007 D1001 R1001 R1002 R1003 R1004 R1005 R1006 R1007 R1008 R1009 R1010 TP1001 TP1002 TP1003 TP1004 TP1005 TP1006 TP? U1001 U1002 U1003 U1004 U? Y1001 Y?
component class LCD: C C1301 C1302 C1303 C1304 C1305 C1306 DISP1301 J1301 R1301 R1302 R1303 R1304 R1305 TP?
component class ESP32: ANT901 ANT? C901 C902 C903 C904 C905 C906 C907 C908 C909 C910 C911 C912 C913 C914 J901 J902 L901 L902 L? R901 R902 R903 TP901 TP902 TP903 TP904 TP? U901 U? Y901 Y?
component class EEPROM: C1101 R1101 R1102 TP1101 TP1102 TP1103 TP? U1101 U?
component class Designator: C401 C402 C403 C404 D401 D402 D? J401 R401 R402 R403 R404 R405 R406 R407 R408 SW401 SW402 SW? TP401 TP402 TP403 TP405 TP406 TP407 TP408 TP? Y401 Y?
component class CH0: C701_8 D701_8 D702_8 R701_8 R702_8 R703_8 R704_8 R705_8
component class Battery_Charging: C1401 C1402 C1403 C1404 C1405 C1406 C1407 C1408 D1401 D1402 D1404 D1405 D? F1401 F1402 F? J1401 Q1401 Q1402 Q? R1401 R1402 R1403 R1404 R1405 R1406 R1407 R1408 R1409 R1410 R1411 R1412 R1413 R1414 R1415 R1416 R1417 R1418 R1419 R1420 R1421 R1422 R1424 R1425 R1426 R1427 R1428 R1429 R1430 R1431 SW1401 SW? TP1401 TP1402 TP1403 TP1404 TP1405 TP1406 TP1407 TP1408 TP1409 TP1410 TP? U1401 U1403 U1404 U1405 U1406 U?
component class ADC_Frontend7: C701_7 D701_7 D702_7 R701_7 R702_7 R703_7 R704_7 R705_7
component class ADC_Frontend6: C701_6 D701_6 D702_6 R701_6 R702_6 R703_6 R704_6 R705_6
component class ADC_Frontend5: C701_5 D701_5 D702_5 R701_5 R702_5 R703_5 R704_5 R705_5
component class ADC_Frontend4: C701_4 D701_4 D702_4 R701_4 R702_4 R703_4 R704_4 R705_4
component class ADC_Frontend3: C701_3 D701_3 D702_3 R701_3 R702_3 R703_3 R704_3 R705_3
component class ADC_Frontend2: C701_2 D701_2 D702_2 R701_2 R702_2 R703_2 R704_2 R705_2
component class ADC_Frontend1: C701_1 D701_1 D702_1 R701_1 R702_1 R703_1 R704_1 R705_1
component class 5V_Regulator: C1501 C1502 C1503 C1504 D1501 D? F1501 F? L1501 L? R1501 R1502 R1503 R1504 R1505 R1506 TP1501 TP1502 TP1503 TP1504 TP? U1501 U1502 U?
component class 3V3_Regulators: C1601 C1602 C1603 C1604 C1605 C1606 C1607 C1608 C1609 C1610 C1611 C1612 D1601 D1602 F1601 F1602 F? L1601 L? R1601 R1602 R1603 R1604 R1605 R1606 R1607 R1608 R1609 R1610 R1611 R1612 TP1601 TP1602 TP1603 TP1604 TP1605 TP? U1601 U1602 U1603 U1604 U?
component class MCU_Power: C301 C302 C303 C304 C305 C306 C307 C308 C309 C310 C311 C312 C313 C314 C315 C316 C317 C318 C319 C320 C321 C322 C323 C324 C325 C326 C327 TP301 TP302 U201
net class SDRAM_DQ[0..15]: SDRAM_DQ0 SDRAM_DQ1 SDRAM_DQ2 SDRAM_DQ3 SDRAM_DQ4 SDRAM_DQ5 SDRAM_DQ6 SDRAM_DQ7 SDRAM_DQ8 SDRAM_DQ9 SDRAM_DQ10 SDRAM_DQ11 SDRAM_DQ12 SDRAM_DQ13 SDRAM_DQ14 SDRAM_DQ15
net class LTDC_RED: LTDC_R0 LTDC_R1 LTDC_R2 LTDC_R3 LTDC_R4 LTDC_R5 LTDC_R6 LTDC_R7
net class SDRAM_BA[0..1]: SDRAM_BA0 SDRAM_BA1
net class SDRAM_A[0..11]: SDRAM_A0 SDRAM_A1 SDRAM_A2 SDRAM_A3 SDRAM_A4 SDRAM_A5 SDRAM_A6 SDRAM_A7 SDRAM_A8 SDRAM_A9 SDRAM_A10 SDRAM_A11
net class LTDC_R[0..7]: LTDC_R0 LTDC_R1 LTDC_R2 LTDC_R3 LTDC_R4 LTDC_R5 LTDC_R6 LTDC_R7
net class LTDC_G[0..7]: LTDC_G0 LTDC_G1 LTDC_G2 LTDC_G3 LTDC_G4 LTDC_G5 LTDC_G6 LTDC_G7
net class LTDC_B[0..7]: LTDC_B0 LTDC_B1 LTDC_B2 LTDC_B3 LTDC_B4 LTDC_B5 LTDC_B6 LTDC_B7
component class SDRAM: C501 C502 C503 C504 C505 C506 C507 C508 s U501
component class ADC: C601 C602 C603 C604 C605 C606 C607 C608 J601 J602 TP601 TP602 TP603 TP604 TP605 TP607 TP608 TP609 TP610 TP611 TP612 TP613 TP614 TP615 TP616 TP617 TP618 TP619 TP620 TP621 TP622 TP623 TP624 TP625 TP626 TP627 TP628 TP629 TP630 TP631 TP632 TP633 TP634 TP635 TP636 TP637 TP638 TP639 U601 Y601
differential pair IN_8: +IN_8_P -IN_8_N
differential pair IN_7: +IN_7_P -IN_7_N
differential pair IN_6: +IN_6_P -IN_6_N
differential pair IN_5: +IN_5_P -IN_5_N
differential pair IN_4: +IN_4_P -IN_4_N
differential pair IN_3: +IN_3_P -IN_3_N
differential pair IN_2: +IN_2_P -IN_2_N
differential pair IN_1: +IN_1_P -IN_1_N
differential pair AIN7: +AIN7_P -AIN7_N
differential pair AIN6: +AIN6_P -AIN6_N
differential pair AIN5: +AIN5_P -AIN5_N
differential pair AIN4: +AIN4_P -AIN4_N
differential pair AIN3: +AIN3_P -AIN3_N
differential pair AIN2: +AIN2_P -AIN2_N
differential pair AIN1: +AIN1_P -AIN1_N
differential pair AIN0: +AIN0_P -AIN0_N
differential pair USB_D: +USB_D_P -USB_D_N
differential pair CON_D: +CON_D_P -CON_D_N

## Components (designator, comment, footprint, x,y, rotation, side; value= is the part's Value field where it differs from the comment)
ANT901 "2.4GHz" Meandering_Inverted_F_Antenna 104,50 r180 top net-tie
C301 "1u" CAP_0603_B 118,80.5 r0 bottom
C302 "100n" CAP_0402_B 118.375,82.5 r0 bottom
C303 "4u7" CAP_0603_B 113.75,87 r90 bottom
C304 "100n" CAP_0402_B 118.5,86 r90 bottom
C305 "100n" CAP_0402_B 118.5,88 r270 bottom
C306 "100n" CAP_0402_B 118.05,84.55 r180 bottom
C307 "100n" CAP_0402_B 118.5,89.5 r0 bottom
C308 "100n" CAP_0402_B 119.5,86 r90 bottom
C309 "100n" CAP_0402_B 119.5,88 r270 bottom
C310 "100n" CAP_0402_B 120.5,86 r90 bottom
C311 "100n" CAP_0402_B 120.5,88 r270 bottom
C312 "100n" CAP_0402_B 121.5,86 r90 bottom
C313 "100n" CAP_0402_B 121.5,88 r270 bottom
C314 "1u" CAP_0603_B 121,77.75 r180 top
C315 "100n" CAP_0402_B 121.75,84.75 r180 bottom
C316 "1u" CAP_0603_B 121,76.25 r180 top
C317 "100n" CAP_0402_B 122.5,86 r90 bottom
C318 "4u7" CAP_0603_B 118.725,96 r0 bottom
C319 "1u" CAP_0603_B 118.725,94.25 r0 bottom
C320 "100n" CAP_0402_B 117.75,92.75 r180 bottom
C321 "4u7" CAP_0603_B 113.75,90.5 r90 bottom
C322 "100n" CAP_0402_B 115.125,83.1 r270 bottom
C323 "100n" CAP_0402_B 115.125,90.9 r90 bottom
C324 "100n" CAP_0402_B 124.875,91.55 r90 bottom
C325 "4u7" CAP_0603_B 113.75,83.5 r270 bottom
C326 "4u7" CAP_0603_B 115.125,92.75 r180 bottom
C327 "4u7" CAP_0603_B 126,90.75 r90 bottom
C401 "10p" CAP_0402_B 119,79.75 r90 top
C402 "10p" CAP_0402_B 123,79.75 r270 top
C403 "100n" CAP_0402_B 164,92 r180 top
C404 "100n" CAP_0402_B 164,82 r180 top
C501 "1u" CAP_0402_B 138,85.75 r180 bottom
C502 "100n" CAP_0402_B 138,90.75 r180 bottom
C503 "100n" CAP_0402_B 142.25,89.75 r270 bottom
C504 "100n" CAP_0402_B 137.25,89.25 r270 bottom
C505 "1u" CAP_0402_B 138.75,89.25 r90 bottom
C506 "100n" CAP_0402_B 137.25,87.25 r270 bottom
C507 "100n" CAP_0402_B 138.75,87.25 r90 bottom
C508 "100n" CAP_0402_B 142.25,84.25 r90 bottom
C601 "1u" CAP_0603_B 76,88.763 r270 bottom
C602 "100n" CAP_0402_B 77.5,89.04 r270 bottom
C603 "1u" CAP_0603_B 76,85.238 r90 bottom
C604 "100n" CAP_0402_B 77.5,84.96 r90 bottom
C605 "100n" CAP_0402_B 75.54,82.46 r180 bottom
C606 "220n" CAP_0402_B 75.54,91.5 r180 bottom
C607 "10p" CAP_0402_B 83.25,90.5 r270 top
C608 "10p" CAP_0402_B 75.75,90.5 r90 top
C701_1 "8n2" CAP_0402_B 63.5,79.5 r90 top (schematic designator C701)
C701_2 "8n2" CAP_0402_B 63.5,79.5 r90 bottom (schematic designator C701)
C701_3 "8n2" CAP_0402_B 63.5,84.5 r270 top (schematic designator C701)
C701_4 "8n2" CAP_0402_B 63.5,84.5 r90 bottom (schematic designator C701)
C701_5 "8n2" CAP_0402_B 63.5,89.5 r270 top (schematic designator C701)
C701_6 "8n2" CAP_0402_B 63.5,89.5 r90 bottom (schematic designator C701)
C701_7 "8n2" CAP_0402_B 63.5,94.5 r270 top (schematic designator C701)
C701_8 "8n2" CAP_0402_B 63.5,94.5 r90 bottom (schematic designator C701)
C801 "1u" CAP_0603_B 107,115 r270 bottom
C802 "100n" CAP_0402_B 93,119.46 r90 bottom
C803 "100n" CAP_0402_B 99.5,118 r180 bottom
C804 "100n" CAP_0402_B 82.5,115 r180 bottom
C901 "1u" CAP_0603_B 101,61 r180 top
C902 "100n" CAP_0402_B 104,60.5 r270 top
C903 "100n" CAP_0402_B 103,60.5 r270 top
C904 "100n" CAP_0402_B 109.5,68.5 r0 top
C905 "100n" CAP_0402_B 112,64.5 r270 top
C906 "100n" CAP_0402_B 112.5,60.54 r270 top
C907 "1u" CAP_0603_B 109,60.5 r270 top
C908 "100n" CAP_0402_B 106.5,60.54 r270 top
C909 "100n" CAP_0402_B 107.5,60.54 r270 top
C910 "1u" CAP_0603_B 107,68.5 r180 top
C911 "10p" CAP_0402_B 102,62.5 r180 top
C912 "10p" CAP_0402_B 102,66.5 r0 top
C913 "3p3" CAP_0402_B 106,58.54 r270 top
C914 "3p3" CAP_0402_B 106.54,56 r180 top
C1001 "1u" CAP_0603_B 150,119.5 r90 top
C1002 "100n" CAP_0402_B 143.5,118.5 r180 top
C1003 "100n" CAP_0402_B 151.5,120 r90 top
C1004 "1F" LIC0813Q3R8106 166,107 r270 top
C1005 "100n" CAP_0402_B 156,113.5 r180 top
C1006 "100n" CAP_0402_B 152,111 r0 top
C1007 "100n" CAP_0402_B 152,103 r0 top
C1101 "100n" CAP_0402_B 58.5,113.5 r180 top
C1201 "1u" CAP_0603_B 75.75,106 r90 top
C1202 "100n" CAP_0402_B 73.5,106 r270 top
C1203 "1u" CAP_0603_B 80.25,106 r270 top
C1301 "100n" CAP_0402_B 90,61 r90 top
C1302 "1u" CAP_0603_B 91,61 r90 top
C1303 "10u" CAP_1206_B 94,61 r0 top
C1304 "100n" CAP_0402_B 90,64 r270 top
C1305 "1u" CAP_0603_B 91,64 r270 top
C1306 "10u" CAP_1206_B 94,64 r0 top
C1401 "100n" CAP_0402_B 99.5,106 r180 bottom
C1402 "100n" CAP_0402_B 92.5,112 r0 bottom
C1403 "100n" CAP_0402_B 232.937,81.762 r90 top
C1404 "100n" CAP_0402_B 103.5,102 r0 bottom
C1405 "4u7" CAP_0603_B 87,116 r180 top
C1406 "4u7" CAP_0603_B 401.447,64.516 r90 top
C1407 "4u7" CAP_0603_B 357.124,64.516 r90 top
C1408 "4u7" CAP_0603_B 454.279,64.516 r90 top
C1501 "22u" CAP_1206_B 234.569,34.671 r90 top
C1502 "100n" CAP_0402_B 179.578,33.655 r90 top
C1503 "22u" CAP_1206_B 207.137,34.671 r90 top
C1504 "100n" CAP_0402_B 276.733,33.655 r90 top
C1601 "4u7" CAP_1206_B 415.544,27.813 r90 top
C1602 "4u7" CAP_1206_B 423.672,27.813 r90 top
C1603 "220n" CAP_0603_B 431.927,26.924 r90 top
C1604 "220n" CAP_0603_B 466.471,26.924 r90 top
C1605 "47u" CAP_1206_B 440.944,27.813 r90 top
C1606 "100n" CAP_0402_B 448.945,26.797 r90 top
C1607 "1u" CAP_0603_B 318.135,26.924 r90 top
C1608 "100n" CAP_0402_B 326.517,26.797 r90 top
C1609 "22u" CAP_1206_B 257.937,27.813 r90 top
C1610 "10n" CAP_0402_B 231.775,26.797 r90 top
C1611 "22u" CAP_1206_B 266.573,27.813 r90 top
C1612 "100n" CAP_0402_B 179.578,26.67 r90 top
C1701 "1u" CAP_0603_B 272,45 r90 top
C1702 "100n" CAP_0402_B 278.249,44.5 r90 top
C1703 "1u" CAP_0603_B 252.999,44.75 r90 top
C1704 "100n" CAP_0402_B 261.499,44.5 r90 top
C1705 "1u" CAP_0603_B 236.25,44.75 r90 top
C1706 "1u" CAP_0402_B 210.25,44.5 r90 top
C1707 "100n" CAP_0402_B 218.75,44.5 r90 top
C1708 "1u" CAP_0402_B 193,44.5 r90 top
C1709 "100n" CAP_0402_B 201.5,44.5 r90 top
C1710 "1u" CAP_0603_B 181,41.5 r90 top
C1801 "100n" CAP_0402_B 162,79.04 r270 bottom
C1802 "100n" CAP_0402_B 162,77.04 r270 bottom
C1803 "100n" CAP_0402_B 162,75.04 r270 bottom
C1804 "100n" CAP_0402_B 56.5,72.54 r270 bottom
C1805 "100n" CAP_0402_B 60.5,71.54 r270 bottom
C1806 "100n" CAP_0402_B 58,69.54 r270 bottom
D401 "LTST-C19HE1WT" LTST-C19HE1WT 45,103 r270 top
D402 "CYAN" SMLD12E3N1WT86 49,103 r90 top
D701_1 "DF2S23P2CTC,L3F" DF2S23P2CTC,L3F 60.5,79.5 r270 top (schematic designator D701)
D701_2 "DF2S23P2CTC,L3F" DF2S23P2CTC,L3F 60.5,79.5 r270 bottom (schematic designator D701)
D701_3 "DF2S23P2CTC,L3F" DF2S23P2CTC,L3F 60.5,84.5 r90 top (schematic designator D701)
D701_4 "DF2S23P2CTC,L3F" DF2S23P2CTC,L3F 62,84.5 r270 bottom (schematic designator D701)
D701_5 "DF2S23P2CTC,L3F" DF2S23P2CTC,L3F 60.5,89.5 r90 top (schematic designator D701)
D701_6 "DF2S23P2CTC,L3F" DF2S23P2CTC,L3F 60.5,89.5 r270 bottom (schematic designator D701)
D701_7 "DF2S23P2CTC,L3F" DF2S23P2CTC,L3F 60.5,94.5 r90 top (schematic designator D701)
D701_8 "DF2S23P2CTC,L3F" DF2S23P2CTC,L3F 60.5,94.5 r270 bottom (schematic designator D701)
D702_1 "DF2S23P2CTC,L3F" DF2S23P2CTC,L3F 62,79.5 r90 top (schematic designator D702)
D702_2 "DF2S23P2CTC,L3F" DF2S23P2CTC,L3F 62,79.5 r90 bottom (schematic designator D702)
D702_3 "DF2S23P2CTC,L3F" DF2S23P2CTC,L3F 62,84.5 r270 top (schematic designator D702)
D702_4 "DF2S23P2CTC,L3F" DF2S23P2CTC,L3F 60.5,84.5 r90 bottom (schematic designator D702)
D702_5 "DF2S23P2CTC,L3F" DF2S23P2CTC,L3F 62,89.5 r270 top (schematic designator D702)
D702_6 "DF2S23P2CTC,L3F" DF2S23P2CTC,L3F 62,89.5 r90 bottom (schematic designator D702)
D702_7 "DF2S23P2CTC,L3F" DF2S23P2CTC,L3F 62,94.5 r270 top (schematic designator D702)
D702_8 "DF2S23P2CTC,L3F" DF2S23P2CTC,L3F 62,94.5 r90 bottom (schematic designator D702)
D1001 "BAS100AS_R1_00001" BAS100AS_R1_00001 144.75,110 r90 top
D1401 "CYAN" SMLD12E3N1WT86 116,115 r90 top
D1402 "CYAN" SMLD12E3N1WT86 114,115 r90 top
D1404 "CYAN" SMLD12E3N1WT86 118,115 r90 top
D1405 "CYAN" SMLD12E3N1WT86 120,115 r90 top
D1501 "CYAN" SMLD12E3N1WT86 122,115 r90 top
D1601 "CYAN" SMLD12E3N1WT86 124,115 r90 top
D1602 "CYAN" SMLD12E3N1WT86 126,115 r90 top
DISP1301 "16249" Waveshare_16249 107,87 r180 top locked
F1401 "1A" 0ZCJ0100FF2E 87,118 r180 top
F1402 "1A" 0ZCJ0100FF2E 103,106 r180 top
F1501 "1A" 0ZCJ0100FF2E 242.57,34.798 r90 top
F1601 "1A" 0ZCJ0100FF2E 493.649,27.94 r90 top
F1602 "100mA" 0ZCH0010FF2E 293.497,27.686 r90 top
J401 "3220-10-0100-00" 3220-10-0100-00 168,87 r90 top
J601 "610116249121" 610116249121 54,87 r270 top
J602 "M20-7920842R" M20-7920842R 54,87 r90 bottom
J801 "USB4105-GF-A" USB4105-GF-A 107,121 r180 top
J901 "U.FL-R-SMT-1(10)" U.FL-R-SMT-1(80) 116,47 r180 top
J902 "M20-8760342" M20-8760342 167,67 r180 top
J1201 "MSD-1-A" MSD-1-A 72.5,116.5 r180 top
J1301 "FH12-40S-0.5SH(55)" FH12-40S-0.5SH(55) 77,56.5 r180 top
J1401 "18650" 1042P 107,65 r0 bottom
J1801 "0532614004" 0532614004 164,70 r0 bottom
J1802 "0532614004" 0532614004 50,70 r0 bottom
L901 "2n2" LQG15HN2N0C02D 107,57.475 r90 top
L902 "2n2" LQG15HN2N0C02D 110.975,61 r0 top
L1501 "IHLP2020BZEK1R0M11" IHLP2020BZEK1R0M11 288.544,35.306 r0 top
L1601 "1u5" 74438324015 486.029,27.051 r90 top
MH101 "M3" M3_Mounting_Hole 46,56 r0 top
MH102 "M3" M3_Mounting_Hole 46,118 r0 top
MH103 "M3" M3_Mounting_Hole 168,118 r0 top
MH104 "M3" M3_Mounting_Hole 168,56 r0 top
Q1401 "DMP2045U-7" DMP2045U-7 108,106 r180 top
Q1402 "DMP2045U-7" DMP2045U-7 115,108 r270 top
R401 "10k" RES_0402_A 164,94 r180 top
R402 "10k" RES_0402_A 164,93 r180 top
R403 "10k" RES_0402_A 164,80 r0 top
R404 "10k" RES_0402_A 164,81 r180 top
R405 "10k" RES_0402_A 52,105.5 r180 top
R406 "10k" RES_0402_A 52,104 r180 top
R407 "10k" RES_0402_A 52,101 r180 top
R408 "1k" RES_0402_A 52,102.5 r180 top
R701_1 "10k" RES_0402_A 61,81 r0 top (schematic designator R701)
R701_2 "10k" RES_0402_A 61,81 r0 bottom (schematic designator R701)
R701_3 "10k" RES_0402_A 61,83 r0 top (schematic designator R701)
R701_4 "10k" RES_0402_A 61,86 r0 bottom (schematic designator R701)
R701_5 "10k" RES_0402_A 61,88 r0 top (schematic designator R701)
R701_6 "10k" RES_0402_A 61,91 r0 bottom (schematic designator R701)
R701_7 "10k" RES_0402_A 61,93 r0 top (schematic designator R701)
R701_8 "10k" RES_0402_A 61,96 r0 bottom (schematic designator R701)
R702_1 "649k" RES_0402_A 63.5,81 r0 top (schematic designator R702)
R702_2 "649k" RES_0402_A 63.5,81 r0 bottom (schematic designator R702)
R702_3 "649k" RES_0402_A 63.5,83 r0 top (schematic designator R702)
R702_4 "649k" RES_0402_A 63.5,86 r0 bottom (schematic designator R702)
R702_5 "649k" RES_0402_A 63.5,88 r0 top (schematic designator R702)
R702_6 "649k" RES_0402_A 63.5,91 r0 bottom (schematic designator R702)
R702_7 "649k" RES_0402_A 63.5,93 r0 top (schematic designator R702)
R702_8 "649k" RES_0402_A 63.5,96 r0 bottom (schematic designator R702)
R703_1 "94k" RES_0402_A 65.5,79.5 r270 top (schematic designator R703)
R703_2 "94k" RES_0402_A 65.5,79.5 r270 bottom (schematic designator R703)
R703_3 "94k" RES_0402_A 65.5,84.5 r90 top (schematic designator R703)
R703_4 "94k" RES_0402_A 65.5,84.5 r270 bottom (schematic designator R703)
R703_5 "94k" RES_0402_A 65.5,89.5 r90 top (schematic designator R703)
R703_6 "94k" RES_0402_A 65.5,89.5 r270 bottom (schematic designator R703)
R703_7 "94k" RES_0402_A 65.5,94.5 r90 top (schematic designator R703)
R703_8 "94k" RES_0402_A 65.5,94.5 r270 bottom (schematic designator R703)
R704_1 "10k" RES_0402_A 61,78 r0 top (schematic designator R704)
R704_2 "10k" RES_0402_A 61,78 r0 bottom (schematic designator R704)
R704_3 "10k" RES_0402_A 61,86 r0 top (schematic designator R704)
R704_4 "10k" RES_0402_A 61,83 r0 bottom (schematic designator R704)
R704_5 "10k" RES_0402_A 61,91 r0 top (schematic designator R704)
R704_6 "10k" RES_0402_A 61,88 r0 bottom (schematic designator R704)
R704_7 "10k" RES_0402_A 61,96 r0 top (schematic designator R704)
R704_8 "10k" RES_0402_A 61,93 r0 bottom (schematic designator R704)
R705_1 "649k" RES_0402_A 63.5,78 r0 top (schematic designator R705)
R705_2 "649k" RES_0402_A 63.5,78 r0 bottom (schematic designator R705)
R705_3 "649k" RES_0402_A 63.5,86 r0 top (schematic designator R705)
R705_4 "649k" RES_0402_A 63.5,83 r0 bottom (schematic designator R705)
R705_5 "649k" RES_0402_A 63.5,91 r0 top (schematic designator R705)
R705_6 "649k" RES_0402_A 63.5,88 r0 bottom (schematic designator R705)
R705_7 "649k" RES_0402_A 63.5,96 r0 top (schematic designator R705)
R705_8 "649k" RES_0402_A 63.5,93 r0 bottom (schematic designator R705)
R801 "5k1" RES_0402_A 104.5,112 r270 top
R802 "5k1" RES_0402_A 109.5,112 r270 top
R803 "10mR" VMS-R010-1.0-U 96,118 r180 top
R804 "10k" RES_0402_A 99.5,119 r0 bottom
R805 "75k" RES_0402_A 88,117 r270 bottom
R806 "75k" RES_0402_A 88,119 r270 bottom
R807 "100k" RES_0402_A 87,119 r270 bottom
R808 "100k" RES_0402_A 87,117 r270 bottom
R809 "10k" RES_0402_A 84.5,115 r180 bottom
R901 "10k" RES_0402_A 113,65.5 r90 top
R902 "0R" RES_0603_A 110.913,54 r0 top
R903 "0R" RES_0603_A 108.65,53.088 r270 top
R1001 "2k2" RES_0402_A 141,118 r270 top
R1002 "2k2" RES_0402_A 124.5,104 r90 top
R1003 "2k2" RES_0402_A 124.5,106 r270 top
R1004 "10R" CRM2512-FX-10R0ELF 148,110 r270 top
R1005 "10mR" VMS-R010-1.0-U 156,107 r180 top
R1006 "10k" RES_0402_A 159,104 r270 top
R1007 "10k" RES_0402_A 159,102 r270 top
R1008 "100k" RES_0402_A 160,103 r90 top
R1009 "10k" RES_0402_A 152,112 r180 top
R1010 "10k" RES_0402_A 152,104 r180 top
R1101 "2k2" RES_0402_A 60.5,104.5 r0 top
R1102 "2k2" RES_0402_A 58,104.5 r0 top
R1201 "22R" RES_0402_A 70.5,106 r90 top
R1202 "22R" RES_0402_A 71.5,106 r90 top
R1203 "22R" RES_0402_A 72.5,106 r90 top
R1204 "22R" RES_0402_A 74.5,106 r90 top
R1205 "22R" RES_0402_A 77,106 r90 top
R1206 "22R" RES_0402_A 78,106 r90 top
R1207 "10k" RES_0402_A 79,106 r90 top
R1301 "2k2" RES_0402_A 72,66 r180 top
R1302 "10k" RES_0402_A 72,68 r0 top
R1303 "10k" RES_0402_A 72,65 r180 top
R1304 "2k2" RES_0402_A 72,67 r180 top
R1305 "2k2" RES_0402_A 72,69 r180 top
R1401 "10k" RES_0402_A 99.5,107 r180 bottom
R1402 "10k" RES_0402_A 92.5,111 r180 bottom
R1403 "10k" RES_0402_A 287.928,81.762 r90 top
R1404 "75k" RES_0402_A 321.71,81.762 r90 top
R1405 "100k" RES_0402_A 260.496,81.762 r90 top
R1406 "100k" RES_0402_A 216.046,81.762 r90 top
R1407 "75k" RES_0402_A 99,111 r90 bottom
R1408 "75k" RES_0402_A 99,109 r90 bottom
R1409 "100k" RES_0402_A 100,109 r90 bottom
R1410 "100k" RES_0402_A 100,111 r90 bottom
R1411 "10k" RES_0402_A 103.5,103 r180 bottom
R1412 "1k" RES_0402_A 116,112.5 r90 top
R1413 "100k" RES_0402_A 108,103.5 r180 top
R1414 "10mR" VMS-R010-1.0-U 96,106 r180 top
R1415 "1k" RES_0402_A 114,113 r180 top
R1416 "1k" RES_0402_A 114,112 r180 top
R1417 "10k" RES_0402_A 409.829,64.262 r90 top
R1418 "10mR" VMS-R010-1.0-U 96,112 r0 top
R1419 "1k" RES_0402_A 119.5,112 r0 top
R1420 "1k" RES_0402_A 119.5,113 r0 top
R1421 "100k" RES_0402_A 115,110.5 r0 top
R1422 "10k" RES_0402_A 84.5,106 r0 bottom
R1424 "10k" RES_0402_A 117.5,112.5 r270 top
R1425 "10k" RES_0402_A 84.5,107 r180 bottom
R1426 "0R" RES_0402_A 84.5,112.5 r180 bottom
R1427 "47k" RES_0402_A 85,110.75 r90 bottom
R1428 "3k" RES_0402_A 84,110.75 r90 bottom
R1429 "6k8" RES_0402_A 85,108.5 r270 bottom
R1430 "6k8" RES_0402_A 84,108.5 r270 bottom
R1431 "10k" RES_0402_A 84.5,105 r180 bottom
R1501 "75k" RES_0402_A 338.963,33.528 r90 top
R1502 "75k" RES_0402_A 330.327,33.528 r90 top
R1503 "100k" RES_0402_A 294.259,33.655 r90 top
R1504 "100k" RES_0402_A 268.097,33.655 r90 top
R1505 "10k" RES_0402_A 302.895,33.655 r90 top
R1506 "1k" RES_0402_A 121.5,112.5 r90 top
R1601 "7k5" RES_0402_A 398.145,26.67 r90 top
R1602 "100k" RES_0402_A 371.221,26.67 r90 top
R1603 "1k" RES_0402_A 123.5,112 r0 top
R1604 "1k" RES_0402_A 123.5,113 r0 top
R1605 "10k" RES_0402_A 457.581,26.67 r90 top
R1606 "10k" RES_0402_A 406.273,26.67 r90 top
R1607 "100k" RES_0402_A 352.425,26.67 r90 top
R1608 "1k" RES_0402_A 126,113 r180 top
R1609 "1k" RES_0402_A 126,112 r180 top
R1610 "10k" RES_0402_A 273.939,26.67 r90 top
R1611 "10k" RES_0402_A 223.901,26.67 r90 top
R1612 "100k" RES_0402_A 196.723,26.67 r90 top
R1701 "100k" RES_0402_A 244.75,44.25 r90 top
R1702 "100k" RES_0402_A 188.5,42.25 r90 top
R1801 "10k" RES_0402_A 160.5,79 r90 bottom
R1802 "1k" RES_0402_A 158.5,79.5 r0 bottom
R1803 "10k" RES_0402_A 160.5,77 r90 bottom
R1804 "1k" RES_0402_A 158.5,77.5 r0 bottom
R1805 "10k" RES_0402_A 160.5,75 r90 bottom
R1806 "1k" RES_0402_A 158.5,75.5 r0 bottom
R1807 "10k" RES_0402_A 58,72.5 r90 bottom
R1808 "1k" RES_0402_A 60,73 r180 bottom
R1809 "10k" RES_0402_A 62,71.5 r90 bottom
R1810 "1k" RES_0402_A 64,72 r180 bottom
R1811 "10k" RES_0402_A 59.5,69.5 r90 bottom
R1812 "1k" RES_0402_A 61.5,70 r180 bottom
SW401 "TS21-34-035-BK-160-SMT-TR" TS21-34-035-BK-160-SMT-TR 168.5,97 r90 top
SW402 "TS21-34-035-BK-160-SMT-TR" TS21-34-035-BK-160-SMT-TR 168,77 r90 top
SW1401 "OS102011MA1QN1" OS102011MA1QN1 133,121 r180 top
TP301 "Net" "Unlabelled Testpoint" 162,93 r90 top
TP302 "Net" "Unlabelled Testpoint" 162,81 r90 top
TP401 "Net" "Unlabelled Testpoint" 162,84 r90 top
TP402 "Net" "Unlabelled Testpoint" 162,87 r90 top
TP403 "Net" "Unlabelled Testpoint" 162,90 r90 top
TP405 "Net" "Unlabelled Testpoint" 54,105.5 r90 top
TP406 "Net" "Unlabelled Testpoint" 54,104 r90 top
TP407 "Net" "Unlabelled Testpoint" 54,101 r90 top
TP408 "Net" "Unlabelled Testpoint" 54,102.5 r90 top
TP601 "Net" "Unlabelled Testpoint" 59,95.5 r0 bottom
TP602 "Net" "Unlabelled Testpoint" 67,95.5 r0 bottom
TP603 "Net" "Unlabelled Testpoint" 59,93.5 r0 bottom
TP604 "Net" "Unlabelled Testpoint" 67,93.5 r0 bottom
TP605 "Net" "Unlabelled Testpoint" 59,93.5 r0 top
TP607 "Net" "Unlabelled Testpoint" 67,93.5 r0 top
TP608 "Net" "Unlabelled Testpoint" 59,95.5 r0 top
TP609 "Net" "Unlabelled Testpoint" 67,95.5 r0 top
TP610 "Net" "Unlabelled Testpoint" 59,90.5 r0 bottom
TP611 "Net" "Unlabelled Testpoint" 67,90.5 r0 bottom
TP612 "Net" "Unlabelled Testpoint" 59,88.5 r0 bottom
TP613 "Net" "Unlabelled Testpoint" 67,88.5 r0 bottom
TP614 "Net" "Unlabelled Testpoint" 59,88.5 r0 top
TP615 "Net" "Unlabelled Testpoint" 67,88.5 r0 top
TP616 "Net" "Unlabelled Testpoint" 59,90.5 r0 top
TP617 "Net" "Unlabelled Testpoint" 67,90.5 r0 top
TP618 "Net" "Unlabelled Testpoint" 59,85.5 r0 bottom
TP619 "Net" "Unlabelled Testpoint" 67,85.5 r0 bottom
TP620 "Net" "Unlabelled Testpoint" 59,83.5 r0 bottom
TP621 "Net" "Unlabelled Testpoint" 67,83.5 r0 bottom
TP622 "Net" "Unlabelled Testpoint" 59,83.5 r0 top
TP623 "Net" "Unlabelled Testpoint" 67,83.5 r0 top
TP624 "Net" "Unlabelled Testpoint" 59,85.5 r0 top
TP625 "Net" "Unlabelled Testpoint" 67,85.5 r0 top
TP626 "Net" "Unlabelled Testpoint" 59,80.5 r0 bottom
TP627 "Net" "Unlabelled Testpoint" 67,80.5 r0 bottom
TP628 "Net" "Unlabelled Testpoint" 59,78.5 r0 bottom
TP629 "Net" "Unlabelled Testpoint" 67,78.5 r0 bottom
TP630 "Net" "Unlabelled Testpoint" 59,80.5 r0 top
TP631 "Net" "Unlabelled Testpoint" 67,80.5 r0 top
TP632 "Net" "Unlabelled Testpoint" 59,78.5 r0 top
TP633 "Net" "Unlabelled Testpoint" 67,78.5 r0 top
TP634 "Net" "Unlabelled Testpoint" 80.5,83.5 r90 top
TP635 "Net" "Unlabelled Testpoint" 80.5,87.5 r90 top
TP636 "Net" "Unlabelled Testpoint" 82,86.5 r90 top
TP637 "Net" "Unlabelled Testpoint" 80.5,85.5 r90 top
TP638 "Net" "Unlabelled Testpoint" 82,84.5 r90 top
TP639 "Net" "Unlabelled Testpoint" 79,82.5 r90 top
TP801 "Net" "Labelled Testpoint" 174,37 r90 top
TP802 "Net" "Unlabelled Testpoint" 100,115.5 r90 bottom
TP803 "Net" "Unlabelled Testpoint" 86,113.5 r90 bottom
TP901 "Net" "Unlabelled Testpoint" 111.5,68.5 r90 top
TP902 "Net" "Unlabelled Testpoint" 114,68.5 r90 top
TP903 "Net" "Unlabelled Testpoint" 115,65.5 r90 top
TP904 "Net" "Unlabelled Testpoint" 116.5,64 r90 top
TP1001 "Net" "Unlabelled Testpoint" 139.5,117.5 r90 top
TP1002 "Net" "Unlabelled Testpoint" 139.5,119.5 r90 top
TP1003 "Net" "Unlabelled Testpoint" 122.5,103 r90 top
TP1004 "Net" "Unlabelled Testpoint" 123,101 r90 top
TP1005 "Net" "Unlabelled Testpoint" 151.5,113.5 r90 top
TP1006 "Net" "Unlabelled Testpoint" 150.5,101.5 r90 top
TP1101 "Net" "Unlabelled Testpoint" 61,103 r0 top
TP1102 "Net" "Unlabelled Testpoint" 58.5,103 r0 top
TP1103 "Net" "Unlabelled Testpoint" 56,103 r0 top
TP1201 "Net" "Unlabelled Testpoint" 70.472,103.472 r90 bottom
TP1202 "Net" "Unlabelled Testpoint" 71.5,104.5 r90 bottom
TP1203 "Net" "Unlabelled Testpoint" 72.528,103.472 r45 bottom
TP1204 "Net" "Unlabelled Testpoint" 74.5,104.5 r90 bottom
TP1205 "Net" "Unlabelled Testpoint" 77.5,104 r90 bottom
TP1206 "Net" "Unlabelled Testpoint" 79.5,104 r90 bottom
TP1207 "Net" "Unlabelled Testpoint" 81.5,104 r90 bottom
TP1401 "Net" "Unlabelled Testpoint" 427.247,81.889 r90 top
TP1402 "Net" "Unlabelled Testpoint" 374.923,82.016 r90 top
TP1403 "Net" "Unlabelled Testpoint" 90.5,112 r90 bottom
TP1404 "Net" "Unlabelled Testpoint" 250.717,82.016 r90 top
TP1405 "Net" "Unlabelled Testpoint" 278.149,82.016 r90 top
TP1406 "Net" "Labelled Testpoint" 444.5,64.516 r90 top
TP1407 "Net" "Labelled Testpoint" 515.239,64.516 r90 top
TP1408 "Net" "Unlabelled Testpoint" 488.442,64.516 r90 top
TP1409 "Net" "Unlabelled Testpoint" 249.936,64.516 r90 top
TP1410 "Net" "Unlabelled Testpoint" 240.03,64.516 r90 top
TP1501 "Net" "Unlabelled Testpoint" 250.698,33.782 r90 top
TP1502 "Net" "Unlabelled Testpoint" 196.85,33.909 r90 top
TP1503 "Net" "Labelled Testpoint" 224.536,33.909 r90 top
TP1504 "Net" "Unlabelled Testpoint" 311.785,33.909 r90 top
TP1601 "Net" "Unlabelled Testpoint" 380.238,26.924 r90 top
TP1602 "Net" "Labelled Testpoint" 475.488,27.051 r90 top
TP1603 "Net" "Unlabelled Testpoint" 361.442,27.051 r90 top
TP1604 "Net" "Labelled Testpoint" 282.956,27.051 r90 top
TP1605 "Net" "Unlabelled Testpoint" 205.486,27.051 r90 top
U201 "STM32H725IGK3" STM32H725IGK3 120,87 r90 top locked
U501 "AS4C8M16SA-6BINTR" AS4C8M16SA-6BINTR 138,87 r0 top locked
U601 "ADS131M08IRSNT" ADS131M08IRSNT 73,87 r0 top
U801 "USBLC6-2SC6" USBLC6-2SC6 107,112 r270 top
U802 "REF3016EAIDBZR" REF3016EAIDBZR 90.5,118 r180 bottom
U803 "INA181A2QDBVRQ1" INA181A2QDBVRQ1 96,118 r180 bottom
U804 "MCP6071T-E/OT" MCP6071T-E/OT 84,118 r270 bottom
U901 "ESP32-C3FH4X" ESP32-C3FH4X 107,65 r90 top
U1001 "PCF85363ATL" PCF85363ATL/AX 147,117.5 r90 top
U1002 "INA181A2QDBVRQ1" INA181A2QDBVRQ1 156,111 r0 top
U1003 "MCP6071T-E/OT" MCP6071T-E/OT 156,103 r0 top
U1004 "REF3016EAIDBZR" REF3016EAIDBZR 160,111 r0 top
U1101 "M24C02-WMN6TP" M24C02-WMN6TP 58.5,110 r0 top
U1401 "INA181A2QDBVRQ1" INA181A2QDBVRQ1 96,106 r180 bottom
U1403 "INA181A2QDBVRQ1" INA181A2QDBVRQ1 96,112 r0 bottom
U1404 "MCP6071T-E/OT" MCP6071T-E/OT 305.708,82.651 r90 top
U1405 "MCP6071T-E/OT" MCP6071T-E/OT 103,106 r270 bottom
U1406 "BQ24074RGTR" BQ24074RGTR 87.5,110 r90 top
U1501 "TPS61232DRC" TPS61232DRCR 261.366,34.29 r90 top
U1502 "MCP6071T-E/OT" MCP6071T-E/OT 322.961,34.544 r90 top
U1601 "LM63615DQDRRRQ1" LM63615DQDRRRQ1 502.539,27.559 r90 top
U1602 "MCP6071T-E/OT" MCP6071T-E/OT 390.779,27.686 r90 top
U1603 "TPS79933DDC" TPS79933DDCR 302.387,27.559 r90 top
U1604 "MCP6071T-E/OT" MCP6071T-E/OT 216.535,27.686 r90 top
U1701 "TLA2528" TLA2528 294.5,45 r90 top
U1702 "TLA2528" TLA2528 95,97.5 r270 top
Y401 "STDCZS1-25M" STDCZS1-25M 121,79.75 r180 top
Y601 "LFXTAL061486" LFXTAL061486 79.5,90.5 r0 top
Y901 "ECS-400-10-37B2-CKY-TR" ECS-400-10-37B2-CKY-TR 102,64.5 r270 top
Y1001 "SC32S-7PF20PPM" SC32S-7PF20PPM 151.75,116.75 r270 top

## Footprints (in the part's own frame and the unit in brackets; to place one, negate y for a bottom-side part, rotate by r counter-clockwise, add the part's x,y. Pads: shape width x height; smd on the part's side, far side on the other; paste and mask are expansions set on the pad)
0ZCH0010FF2E [mm]
  rrect25% 1x2.8 smd: 1(-1.5,0) 2(1.5,0)
  silkscreen extent -0.7,-1.4 0.7,1.4, body extent -1.61,-1.29 1.61,1.29, height 1.15
0ZCJ0100FF2E [mm]
  rrect25% 1x1.9 smd: 1(-1.95,0) 2(1.95,0)
  silkscreen extent -1.2,-0.9 1.2,0.9, body extent -1.63,-0.82 1.63,0.82, height 0.82
1042P [mm] "Battery Holder (Open) 18650 1 Cell SMD (SMT) Tab"
  rrect25% 7.3x6.4 smd: 1(41.175,0) 2(-41.175,0)
  round 1.524 hole 3.5 unplated: 2(-27.6,-8) 2(27.6,8)
  round 1.524 hole 2.4 unplated: 2(35.82,-8)
  silkscreen extent -39,-11 39,11, body extent -43,-10.33 43,10.33, height 14.86
3220-10-0100-00 [mm] "Connector Header Through Hole 10 position 0.050\" (1.27mm)"
  round 1 hole 0.7: 1(-2.54,-0.635) 2(-2.54,0.635) 3(-1.27,-0.635) 4(-1.27,0.635) 5(0,-0.635) 6(0,0.635) 7(1.27,-0.635) 8(1.27,0.635) 9(2.54,-0.635) 10(2.54,0.635)
  silkscreen extent -6.5,-2.75 6.5,2.75, body extent -6.32,-2.55 6.32,2.55, height 5.4
0532614004 [mm] "Connector Header Surface Mount, Right Angle 4 position 0.049\" (1.25mm)"
  rrect25% 0.8x1.6 smd: 1(1.875,-2.6) 2(0.625,-2.6) 3(-0.625,-2.6) 4(-1.875,-2.6)
  rrect25% 2.1x3 smd: M(-4.425,0.3) M(4.425,0.3)
  silkscreen extent -5.25,-2.75 5.25,-1.5, body extent -5.07,-2.6 5.07,2.6, height 3.2
74438324015 [mm]
  rrect25% 0.75x2.3 smd: 1(-0.925,0) 2(0.925,0)
  silkscreen extent -0.3,-1 0.3,1, body extent -1.25,-1 1.25,1, height 1.2
610116249121 [mm] "Connector Header Surface Mount, Right Angle 16 position 0.100\" (2.54mm)"
  rrect25% 1x2.5 smd: 1(8.89,-1.85) 2(8.89,1.85) 3(6.35,-1.85) 4(6.35,1.85) 5(3.81,-1.85) 6(3.81,1.85) 7(1.27,-1.85) 8(1.27,1.85) 9(-1.27,-1.85) 10(-1.27,1.85) 11(-3.81,-1.85) 12(-3.81,1.85) 13(-6.35,-1.85) 14(-6.35,1.85) 15(-8.89,-1.85) 16(-8.89,1.85)
  round 1.524 hole 1.8 unplated: 5(-7.62,-6.3) 5(7.62,-6.3)
  silkscreen extent -10,-3.5 10,3.5, body extent -10.16,-13.52 10.16,2.64, height 5.09
ADS131M08IRSNT [mm] "PQFN, 32-Leads, Body 4.00x4.00mm, Pitch 0.40mm, Thermal Pad 2.80x2.80mm, IPC Medium Density"
  oval 0.45x0.25 smd: 1(-1.825,1.4) 2(-1.825,1) 3(-1.825,0.6) 4(-1.825,0.2) 5(-1.825,-0.2) 6(-1.825,-0.6) 7(-1.825,-1) 8(-1.825,-1.4) 17(1.825,-1.4) 18(1.825,-1) 19(1.825,-0.6) 20(1.825,-0.2) 21(1.825,0.2) 22(1.825,0.6) 23(1.825,1) 24(1.825,1.4)
  oval 0.25x0.45 smd: 9(-1.4,-1.825) 10(-1,-1.825) 11(-0.6,-1.825) 12(-0.2,-1.825) 13(0.2,-1.825) 14(0.6,-1.825) 15(1,-1.825) 16(1.4,-1.825) 25(1.4,1.825) 26(1,1.825) 27(0.6,1.825) 28(0.2,1.825) 29(-0.2,1.825) 30(-0.6,1.825) 31(-1,1.825) 32(-1.4,1.825)
  rect 2.8x2.8 smd paste-1.4: 33(0,0)
  silkscreen extent -2.51,-2.11 2.11,2.11, body extent -2,-2 2,2, height 0.8
AS4C8M16SA-6BINTR [mm] "BGA, 54-Leads, Body 8.00x8.00mmx1.20mm, Pitch 0.80mm"
  round 0.4 smd: A1(-3.2,3.2) A2(-2.4,3.2) A3(-1.6,3.2) A7(1.6,3.2) A8(2.4,3.2) A9(3.2,3.2) B1(-3.2,2.4) B2(-2.4,2.4) B3(-1.6,2.4) B7(1.6,2.4) B8(2.4,2.4) B9(3.2,2.4) C1(-3.2,1.6) C2(-2.4,1.6) C3(-1.6,1.6) C7(1.6,1.6) C8(2.4,1.6) C9(3.2,1.6) D1(-3.2,0.8) D2(-2.4,0.8) D3(-1.6,0.8) D7(1.6,0.8) D8(2.4,0.8) D9(3.2,0.8) E1(-3.2,0) E2(-2.4,0) E3(-1.6,0) E7(1.6,0) E8(2.4,0) E9(3.2,0) F1(-3.2,-0.8) F2(-2.4,-0.8) F3(-1.6,-0.8) F7(1.6,-0.8) F8(2.4,-0.8) F9(3.2,-0.8) G1(-3.2,-1.6) G2(-2.4,-1.6) G3(-1.6,-1.6) G7(1.6,-1.6) G8(2.4,-1.6) G9(3.2,-1.6) H1(-3.2,-2.4) H2(-2.4,-2.4) H3(-1.6,-2.4) H7(1.6,-2.4) H8(2.4,-2.4) H9(3.2,-2.4) J1(-3.2,-3.2) J2(-2.4,-3.2) J3(-1.6,-3.2) J7(1.6,-3.2) J8(2.4,-3.2) J9(3.2,-3.2)
  silkscreen extent -4.72,-4.11 4.11,4.11, body extent -4,-4 4,4, height 1.2
BAS100AS_R1_00001 [mm] "Diode 100 V 500mA Surface Mount SOD-123"
  rrect25% 0.97x1.22 smd: 1(-1.64,0) 2(1.64,0)
  silkscreen extent -1.2,-0.9 2.3,0.9, body extent -1.93,-0.83 1.93,0.83, height 1.35
BQ24074RGTR [mm] "PQFN, 16-Leads, Body 3.00x3.00mm, Pitch 0.50mm, Thermal Pad 1.68x1.68mm, IPC Medium Density"
  oval 0.5x0.3 smd: 1(-1.3,0.75) 2(-1.3,0.25) 3(-1.3,-0.25) 4(-1.3,-0.75) 9(1.3,-0.75) 10(1.3,-0.25) 11(1.3,0.25) 12(1.3,0.75)
  oval 0.3x0.5 smd: 5(-0.75,-1.3) 6(-0.25,-1.3) 7(0.25,-1.3) 8(0.75,-1.3) 13(0.75,1.3) 14(0.25,1.3) 15(-0.25,1.3) 16(-0.75,1.3)
  rect 1.68x1.68 smd paste-0.309: 17(0,0)
  silkscreen extent -2.01,-1.61 1.61,1.61, body extent -1.5,-1.5 1.5,1.5, height 1
CAP_0402_B [mm] "Chip Capacitor, 2-Leads, Body 1.00x0.50mm, IPC Medium Density"
  rrect25% 0.6x0.62 smd: 1(-0.46,0) 2(0.46,0)
  body extent -0.5,-0.25 0.5,0.25, height 0.5
CAP_0603_B [mm] "Chip Capacitor, 2-Leads, Body 1.60x0.80mm, IPC Medium Density"
  rrect25% 0.975x0.95 smd: 1(-0.737,0) 2(0.738,0)
  body extent -0.8,-0.4 0.8,0.4, height 0.8
CAP_1206_B [mm] "Chip Capacitor, 2-Leads, Body 3.20x1.50mm, IPC Medium Density"
  rrect25% 1.225x1.65 smd: 1(-1.488,0) 2(1.488,0)
  silkscreen extent -0.61,-0.86 0.61,0.86, body extent -1.6,-0.75 1.6,0.75, height 1.25
CRM2512-FX-10R0ELF [mm] "Chip Resistor, 2-Leads, Body 6.30x3.10mm, IPC Medium Density"
  rrect25% 1.225x3.3 smd: 1(-2.988,0) 2(2.988,0)
  silkscreen extent -2.11,-1.71 2.11,1.71, body extent -3.15,-1.55 3.15,1.55, height 0.8
DF2S23P2CTC,L3F [mm]
  rrect25% 0.65x0.7 smd: 1(-0.425,0)
  rrect25% 0.45x0.7 smd: 2(0.525,0)
  silkscreen extent 1,-0.3 1,0.3, body extent -0.8,-0.4 0.8,0.4, height 0.48
DMP2045U-7 [mm] "SOT23, 3-Leads, Body 2.90x2.40mm, Pitch 0.90mm, IPC Medium Density"
  oval 1.25x0.6 smd: 1(-1.025,0.9) 2(-1.025,-0.9) 3(1.025,0)
  silkscreen extent -1.59,-1.56 0.76,1.59, body extent -1.28,-1.45 1.28,1.45, height 1.15
ECS-400-10-37B2-CKY-TR [mm]
  rrect25% 0.85x0.75 smd: 1(-0.675,-0.525) 2(0.675,-0.525) 3(0.675,0.525) 4(-0.675,0.525)
  silkscreen extent -1.3,-1.1 -0.7,-0.5, body extent -1.05,-0.85 1.05,0.85, height 0.51
ESP32-C3FH4X [mm] "PQFN, 32-Leads, Body 5.00x5.00mm, Pitch 0.50mm, Thermal Pad 3.70x3.70mm, IPC Medium Density"
  oval 0.475x0.3 smd: 1(-2.288,1.75) 2(-2.288,1.25) 3(-2.288,0.75) 4(-2.288,0.25) 5(-2.288,-0.25) 6(-2.288,-0.75) 7(-2.288,-1.25) 8(-2.288,-1.75) 17(2.287,-1.75) 18(2.287,-1.25) 19(2.287,-0.75) 20(2.287,-0.25) 21(2.287,0.25) 22(2.287,0.75) 23(2.287,1.25) 24(2.287,1.75)
  oval 0.3x0.475 smd: 9(-1.75,-2.287) 10(-1.25,-2.287) 11(-0.75,-2.287) 12(-0.25,-2.287) 13(0.25,-2.287) 14(0.75,-2.287) 15(1.25,-2.287) 16(1.75,-2.287) 25(1.75,2.288) 26(1.25,2.288) 27(0.75,2.288) 28(0.25,2.288) 29(-0.25,2.288) 30(-0.75,2.288) 31(-1.25,2.288) 32(-1.75,2.288)
  rect 3.7x3.7 smd paste-1.85: 33(0,0)
  silkscreen extent -3.18,-2.59 2.59,2.59, body extent -2.5,-2.5 2.5,2.5, height 0.9
FH12-40S-0.5SH(55) [mm] "40 Position FFC, FPC Connector Contacts, Bottom 0.020\" (0.50mm) Surface Mount, Right Angle"
  rrect25% 0.25x1.3 smd: 1(-9.75,-3.35) 2(-9.25,-3.35) 3(-8.75,-3.35) 4(-8.25,-3.35) 5(-7.75,-3.35) 6(-7.25,-3.35) 7(-6.75,-3.35) 8(-6.25,-3.35) 9(-5.75,-3.35) 10(-5.25,-3.35) 11(-4.75,-3.35) 12(-4.25,-3.35) 13(-3.75,-3.35) 14(-3.25,-3.35) 15(-2.75,-3.35) 16(-2.25,-3.35) 17(-1.75,-3.35) 18(-1.25,-3.35) 19(-0.75,-3.35) 20(-0.25,-3.35) 21(0.25,-3.35) 22(0.75,-3.35) 23(1.25,-3.35) 24(1.75,-3.35) 25(2.25,-3.35) 26(2.75,-3.35) 27(3.25,-3.35) 28(3.75,-3.35) 29(4.25,-3.35) 30(4.75,-3.35) 31(5.25,-3.35) 32(5.75,-3.35) 33(6.25,-3.35) 34(6.75,-3.35) 35(7.25,-3.35) 36(7.75,-3.35) 37(8.25,-3.35) 38(8.75,-3.35) 39(9.25,-3.35) 40(9.75,-3.35)
  rrect25% 1.8x2.2 smd: M(-11.65,-0.1) M(11.65,-0.1)
  silkscreen extent -11.76,-3.26 11.5,3, body extent -12.05,-3.5 12.05,2.9, height 2.05
IHLP2020BZEK1R0M11 [mm]
  rrect25% 1.905x2.79 smd: 1(-2.425,0) 2(2.425,0)
  silkscreen extent -2.9,-2.7 2.9,2.7, body extent -2.75,-2.57 2.7,2.57, height 1.9
INA181A2QDBVRQ1 [mm] "SOT23, 6-Leads, Body 2.90x2.80mm, Pitch 0.95mm, IPC Medium Density"
  oval 1.4x0.6 smd: 1(-1.15,0.95) 2(-1.15,0) 3(-1.15,-0.95) 4(1.15,-0.95) 5(1.15,0) 6(1.15,0.95)
  silkscreen extent -1.79,-1.59 0.94,1.76, body extent -1.5,-1.45 1.5,1.45, height 1.1
"Labelled Testpoint" [mm] "2mm Diameter testpoint with silkscreen for labelling"
  round 2 smd paste-2539.97: 1(0,0)
  silkscreen extent -1.15,-1.15 1.15,1.15
LFXTAL061486 [mm] "8.192 MHz ±30ppm Crystal 10pF 150 Ohms 4-SMD, No Lead"
  rrect25% 1.6x1.4 smd: 1(-1.9,-1.15) 2(1.9,-1.15) 3(1.9,1.15) 4(-1.9,1.15)
  silkscreen extent -3,-2.1 -1.1,-0.4, body extent -2.5,-1.6 2.5,1.6, height 1
LIC0813Q3R8106 [mm] "10 F (EDLC) Supercapacitor 3.8 V Radial, Can 510mOhm @ 1kHz 1000 Hrs @ 85°C"
  round 1.5 hole 1: 1(-1.75,0) 2(1.75,0)
  silkscreen extent -5.3,-4.1 5.3,4.1, body extent -4,-4 4,4, height 14.5
LM63615DQDRRRQ1 [mm] "SON, 12-Leads, Body 3.00x3.00mm, Pitch 0.50mm, Thermal Pad 2.50x1.30mm, IPC Medium Density"
  oval 0.85x0.25 smd: 1(-1.425,1.25) 2(-1.425,0.75) 3(-1.425,0.25) 4(-1.425,-0.25) 5(-1.425,-0.75) 6(-1.425,-1.25) 7(1.425,-1.25) 8(1.425,-0.75) 9(1.425,-0.25) 10(1.425,0.25) 11(1.425,0.75) 12(1.425,1.25)
  rect 1.3x2.5 smd paste-0.306: 13(0,0)
  silkscreen extent -2.01,-1.61 0.67,1.76, body extent -1.5,-1.5 1.5,1.5, height 0.8
LQG15HN2N0C02D [mm] "Chip Inductor, 2-Leads, Body 1.00x0.50mm, IPC Medium Density"
  rrect25% 0.57x0.62 smd: 1(-0.475,0) 2(0.475,0)
  body extent -0.5,-0.25 0.5,0.25, height 0.5
LTST-C19HE1WT [mm] "Red, Green, Blue (RGB) 624nm Red, 525nm Green, 470nm Blue LED Indication - Discrete 2.1V Red, 3.35V Green, 3.35V Blue 0606 (1616 Metric)"
  rrect25% 0.65x0.85 smd: 1(-0.425,0.725) 2(0.425,0.745) 3(0.425,-0.745) 4(-0.425,-0.725)
  silkscreen extent -0.91,-0.8 0.9,1.11, body extent -0.8,-0.8 0.8,0.8, height 0.35
M3_Mounting_Hole [mm] "Mounting Hole for M3"
  round 1 hole 0.75: 1(-2.708,0.022) 1(-1.922,-1.908) 1(-1.922,1.91) 1(0,-2.7) 1(0,2.7) 1(1.909,-1.909) 1(1.909,1.909) 1(2.7,0)
  round 8 hole 3.4: 1(0,0)
M20-7920842R [mm] "16 Position Receptacle Connector 0.100\" (2.54mm) Surface Mount, Right Angle Gold"
  rrect50% 1x2 smd: 1(8.89,-1.75) 2(8.89,1.75) 3(6.35,-1.75) 4(6.35,1.75) 5(3.81,-1.75) 6(3.81,1.75) 7(1.27,-1.75) 8(1.27,1.75) 9(-1.27,-1.75) 10(-1.27,1.75) 11(-3.81,-1.75) 12(-3.81,1.75) 13(-6.35,-1.75) 14(-6.35,1.75) 15(-8.89,-1.75) 16(-8.89,1.75)
  silkscreen extent -9.75,-3.25 9.75,3, body extent -10.29,-13.12 10.29,2.28, height 5
M20-8760342 [mm] "Connector Header Surface Mount 6 position 0.100\" (2.54mm)"
  rrect50% 1x3.15 smd: 1(-2.54,-2.525) 2(-2.54,2.525) 3(0,-2.525) 4(0,2.525) 5(2.54,-2.525) 6(2.54,2.525)
  body extent -3.81,-3.6 3.81,3.6, height 9.9
M24C02-WMN6TP [mm] "SOIC, 8-Leads, Body 4.90x3.90mm, Pitch 1.27mm, IPC Medium Density"
  oval 1.85x0.6 smd: 1(-2.525,1.905) 2(-2.525,0.635) 3(-2.525,-0.635) 4(-2.525,-1.905) 5(2.525,-1.905) 6(2.525,-0.635) 7(2.525,0.635) 8(2.525,1.905)
  silkscreen extent -3.39,-2.56 2.06,2.59, body extent -3,-2.45 3,2.45, height 1.75
MCP6071T-E/OT [mm] "SOT23, 5-Leads, Body 2.90x2.70mm, Pitch 0.95mm, IPC Medium Density"
  oval 1.3x0.6 smd: 1(-1.3,0.95) 2(-1.3,0) 3(-1.3,-0.95) 4(1.3,-0.95) 5(1.3,0.95)
  silkscreen extent -1.89,-1.61 0.96,1.76, body extent -0.77,-1.45 0.77,1.45, height 1.45
Meandering_Inverted_F_Antenna [mm]
  round 0.4 hole 0.2 mask+0: 1(-6.75,-0.25)
  rect 0.9x5.4 smd paste-2539.97: 1(-6.75,2.2)
  rect 5x0.5 smd paste-2539.97: 2(-4.7,4.65)
  rect 0.5x5.4 smd paste-2539.97: 2(-4.65,2.2)
  rect 0.5x3.14 smd paste-2539.97: 2(-2.45,3.33) 2(0.05,3.33) 2(2.25,3.33) 2(4.75,3.33)
  rect 3x0.5 smd paste-2539.97: 2(-1.2,2) 2(3.5,2)
  rect 2.7x0.5 smd paste-2539.97: 2(1.15,4.65) 2(5.85,4.65)
  rect 0.5x4.44 smd paste-2539.97: 2(6.95,2.68)
  L6 [SIG] pour cut-out: -7.7,5.2 7.5,5.2 7.5,0 -7.7,0
MSD-1-A [mm]
  rect 0.7x1.6 smd: 1(2.25,7.75) 2(1.15,7.75) 3(0.05,7.75) 4(-1.05,7.75) 5(-2.15,7.75) 6(-3.25,7.75) 7(-4.35,7.75) 8(-5.45,7.75) 9(-6.55,7.75)
  rect 1.2x1.8 smd: 10(-7.75,6.45)
  rect 1.2x2.2 smd: 10(-7.75,-2.85) 10(7.75,-2.85)
  rect 1.6x1.5 smd: 10(6.85,6.7)
  round 1 hole 1 unplated: ""(-4.95,-3.25) ""(3.05,-3.25)
  silkscreen extent -7.43,-7.25 7.42,7.25, body extent -8.13,-7.25 8.02,7.8, height 1.85
OS102011MA1QN1 [mm] "Slide Switch SPDT Through Hole, Right Angle"
  round 1.25 hole 0.8: 1(0,0) 2(-2,0) 3(2,0)
  round 2 hole 1.5: 4(-4.1,0) 4(4.1,0)
  silkscreen extent -4.5,-2.25 4.5,2.25, body extent -4.31,-6.18 4.31,2.2, height 4.7
PCF85363ATL/AX [mm] "Real Time Clock (RTC) IC Clock/Calendar 64B I2C, 2-Wire Serial 10-XFDFN Exposed Pad"
  rrect25% 0.25x0.575 smd: 1(-1,-1.238) 2(-0.5,-1.238) 3(0,-1.238) 4(0.5,-1.238) 5(1,-1.238) 6(-1,1.238) 7(-0.5,1.238) 8(0,1.238) 9(0.5,1.238) 10(1,1.238)
  rrect25% 2.2x1.3 smd: 11(0,0)
  silkscreen extent -1.41,-1.61 1.4,1.4, body extent -1.35,-1.35 1.35,1.35, height 0.51